# Altium PCB Revolution.PcbDoc (part 1 of 2)
Units mil, origin at the board's own origin, x right, y up, seen from the top; angles counter-clockwise.
Board outline 1417.32 x 1417.32 mil, 4 copper layers (Top Layer, Power, Ground, Bottom Layer), stack 89.2 mil thick; 97 components, 92 nets, 401 pads, 208 vias.
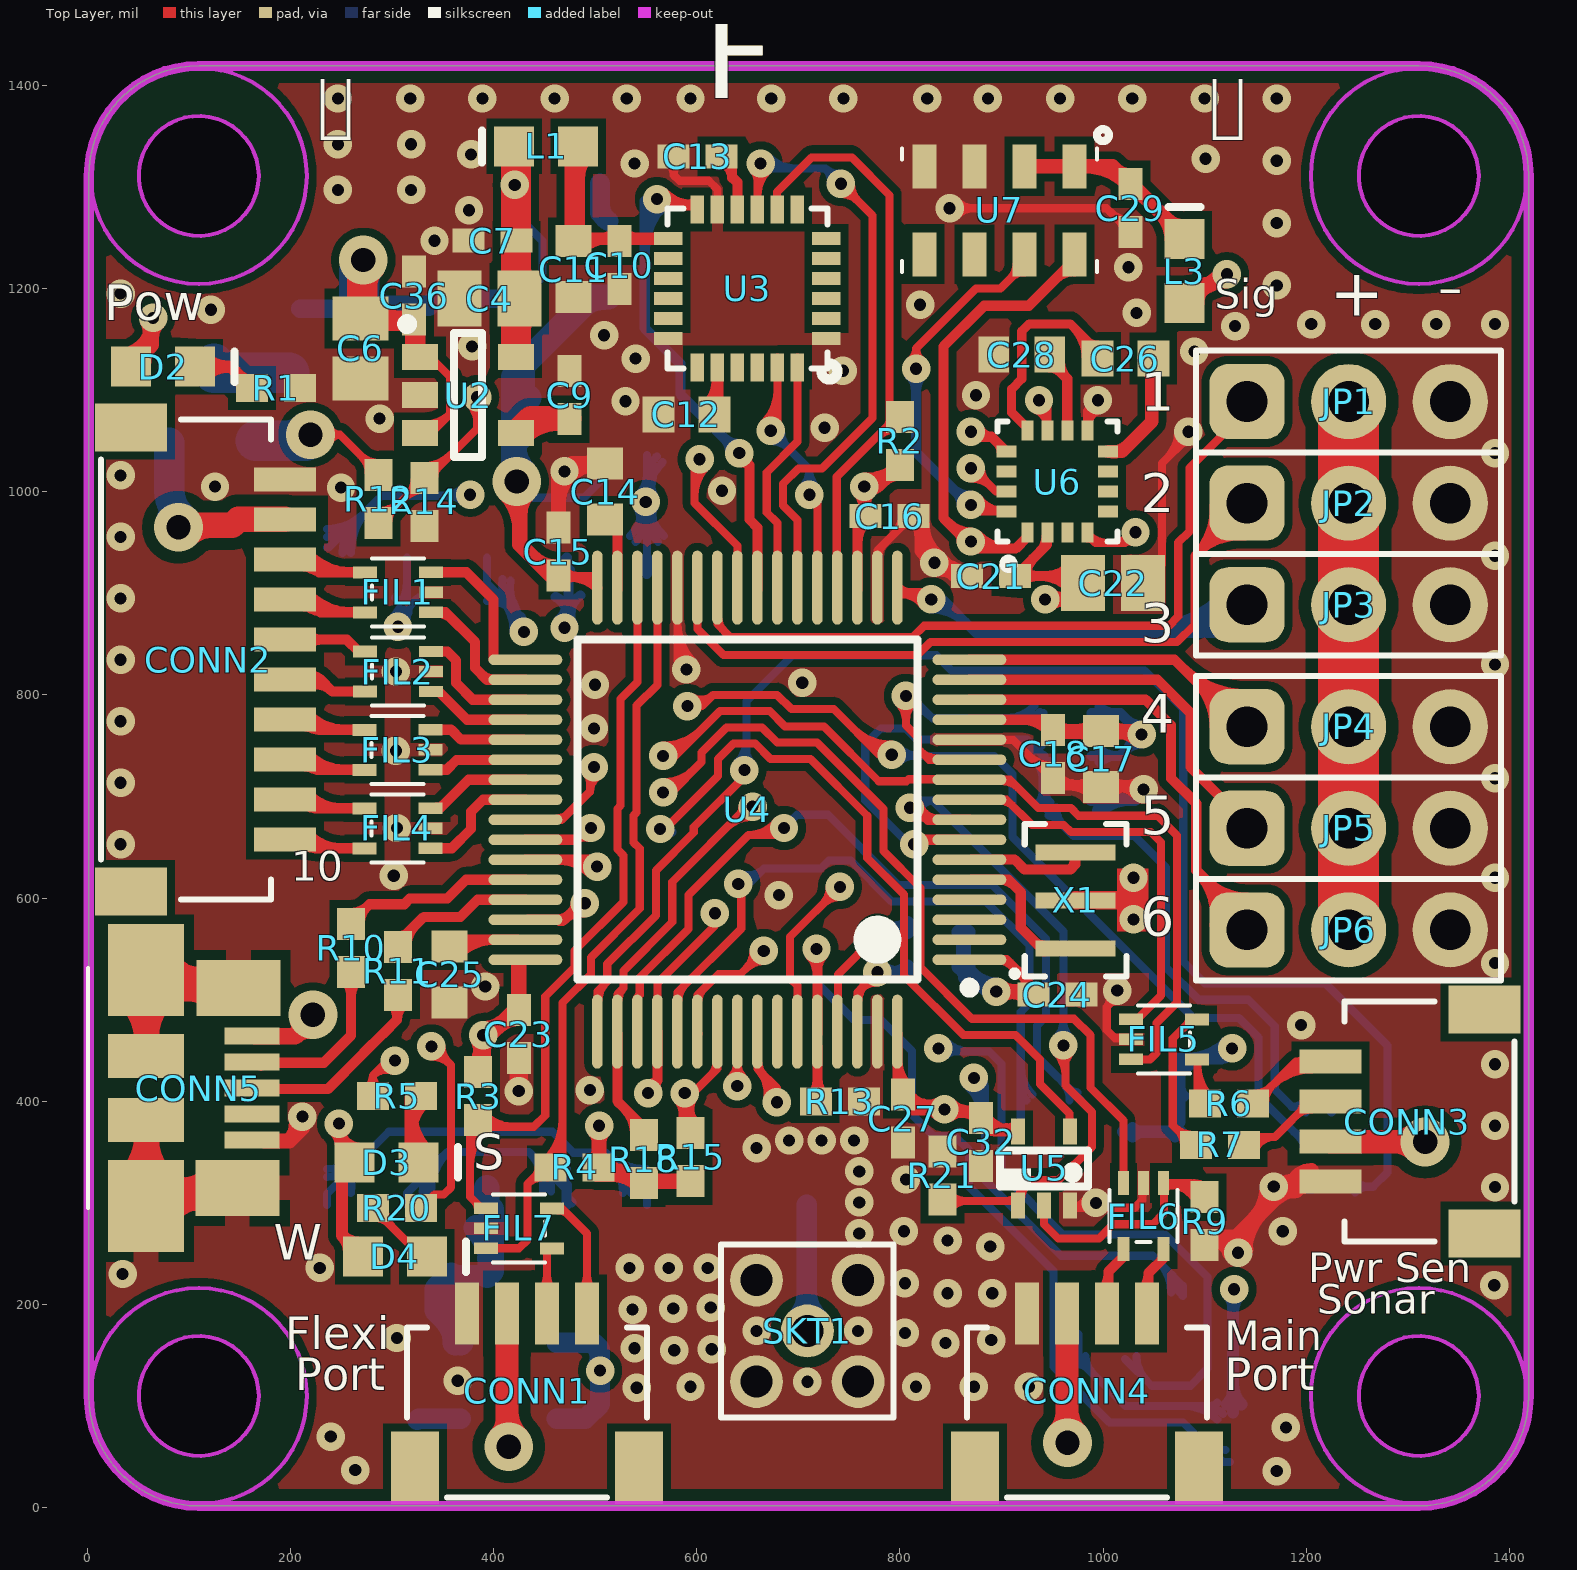
[diagram p0: Top Layer view]
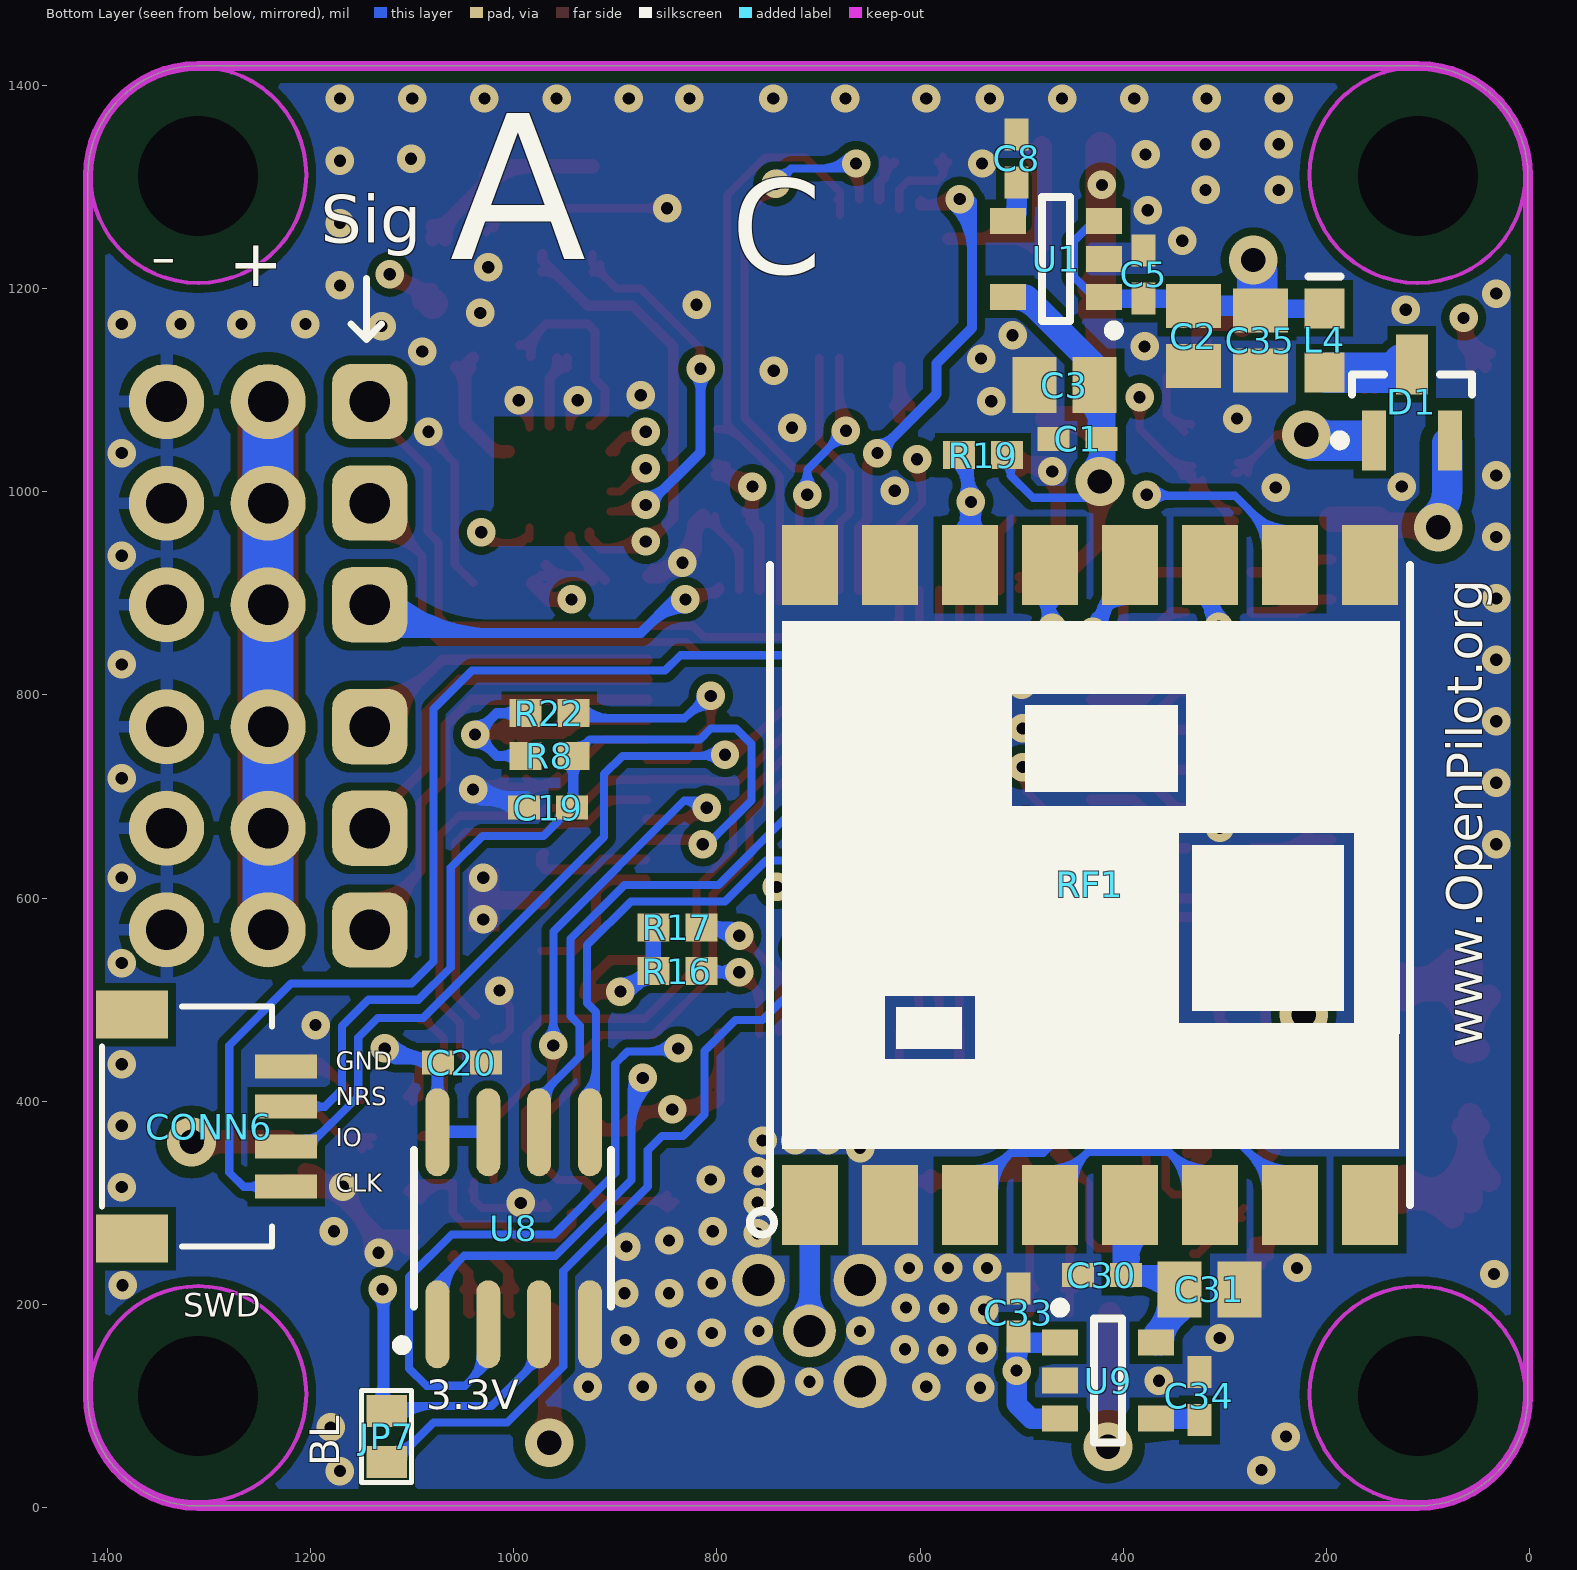
[diagram p1: Bottom Layer view, seen from below]
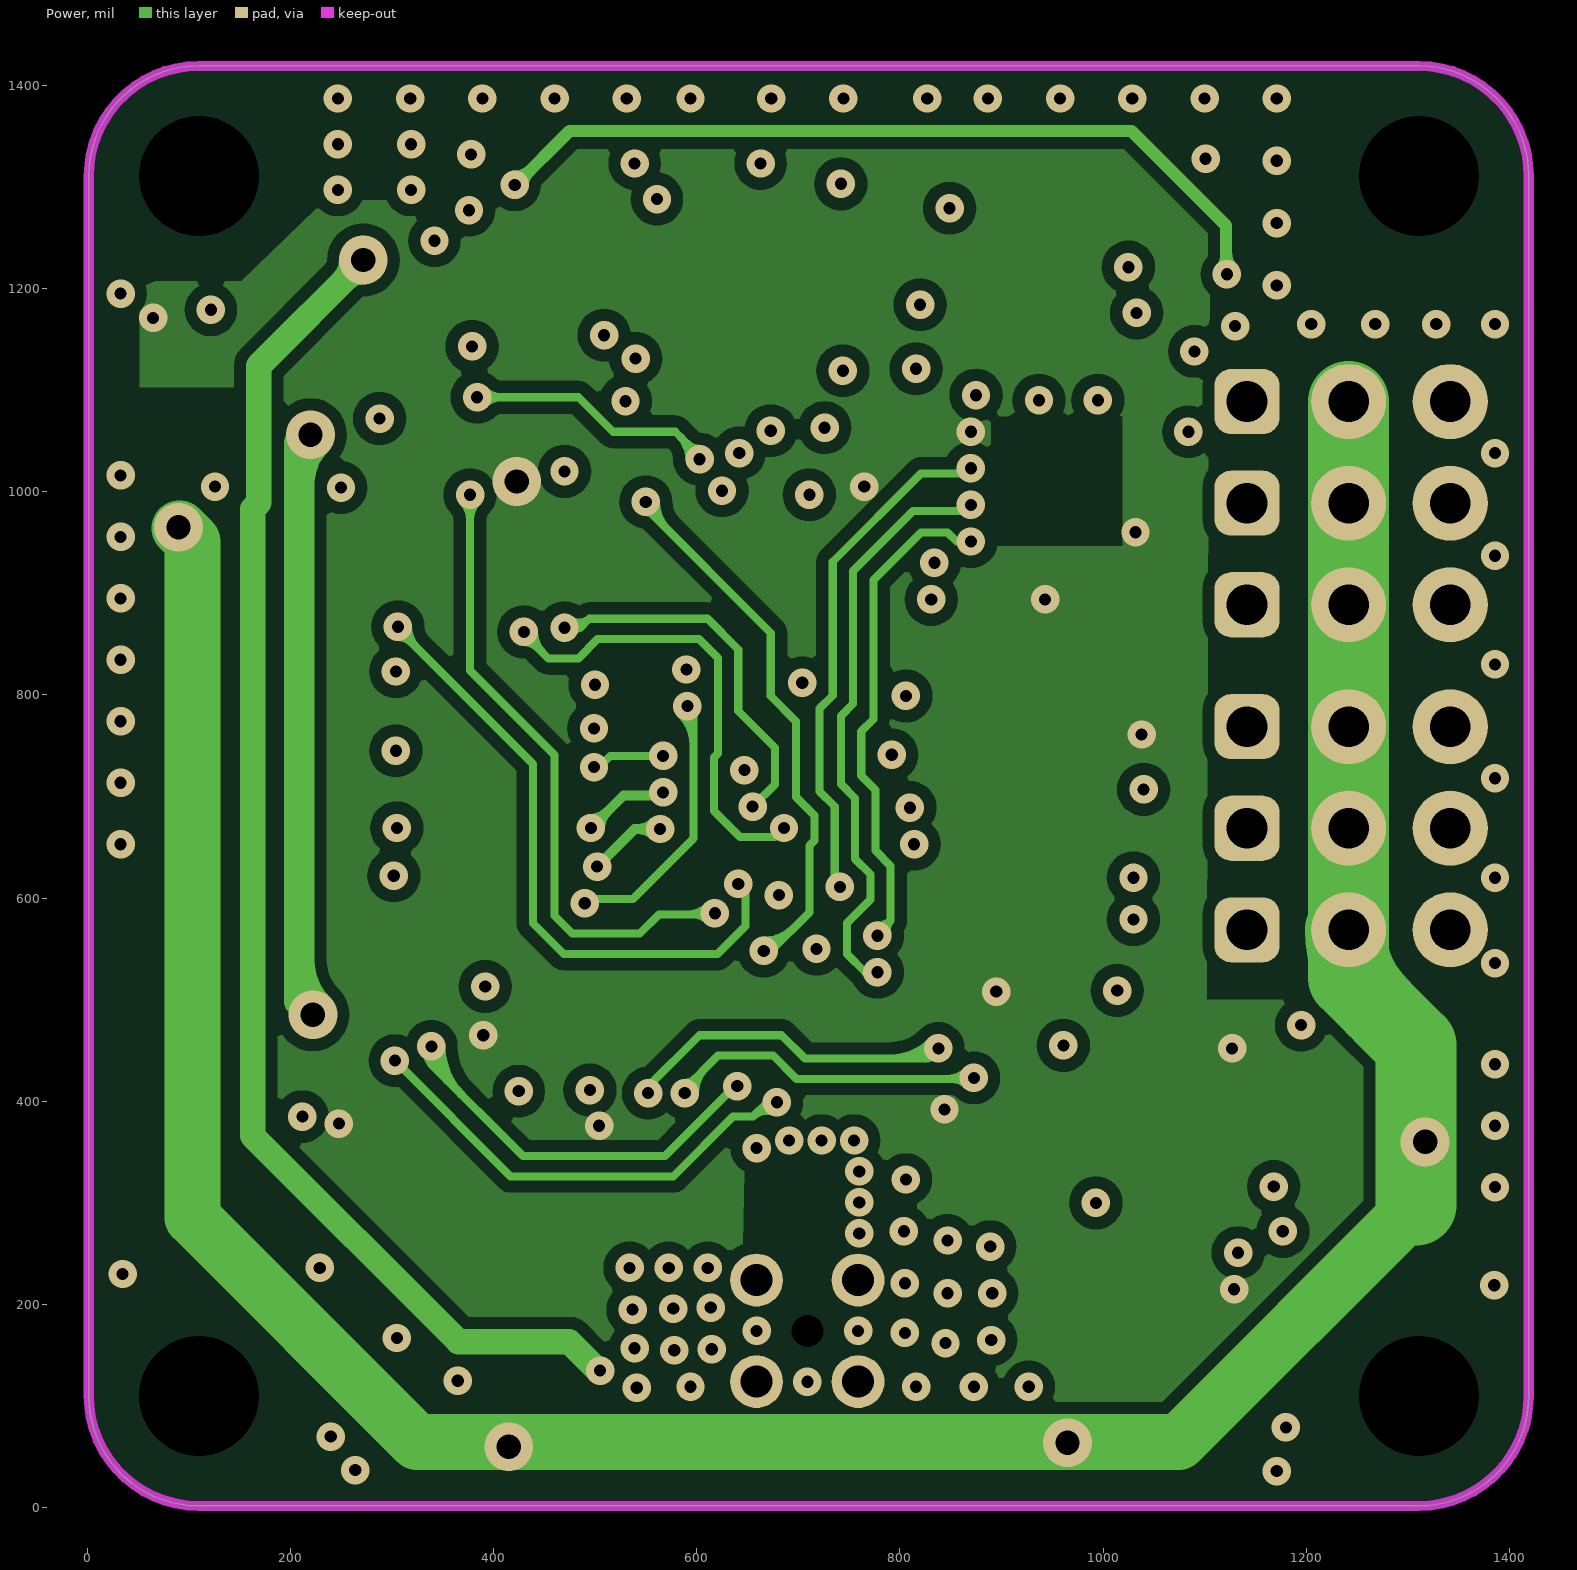
[diagram p2: Power]
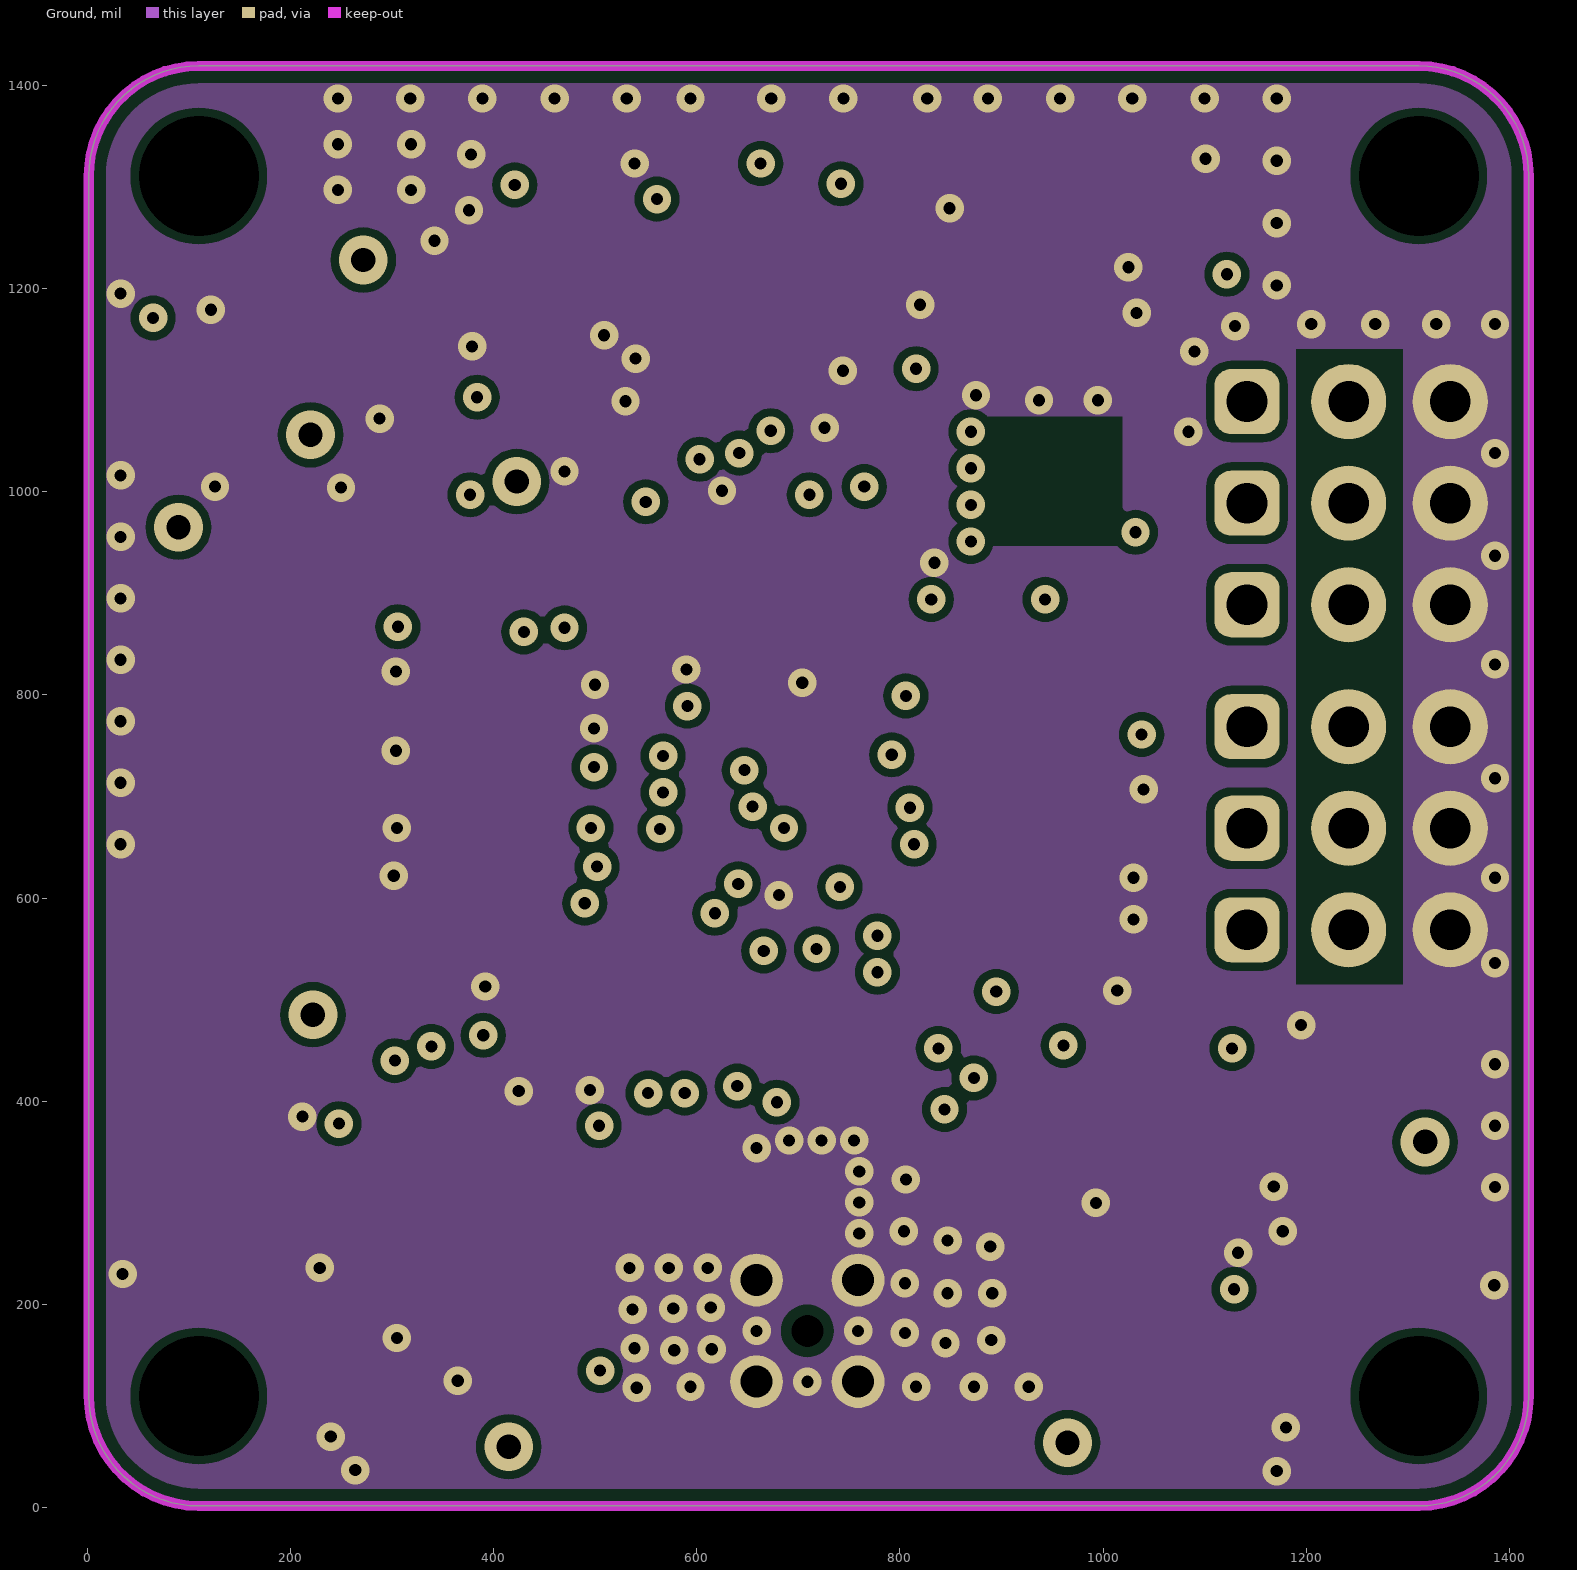
[diagram p3: Ground]
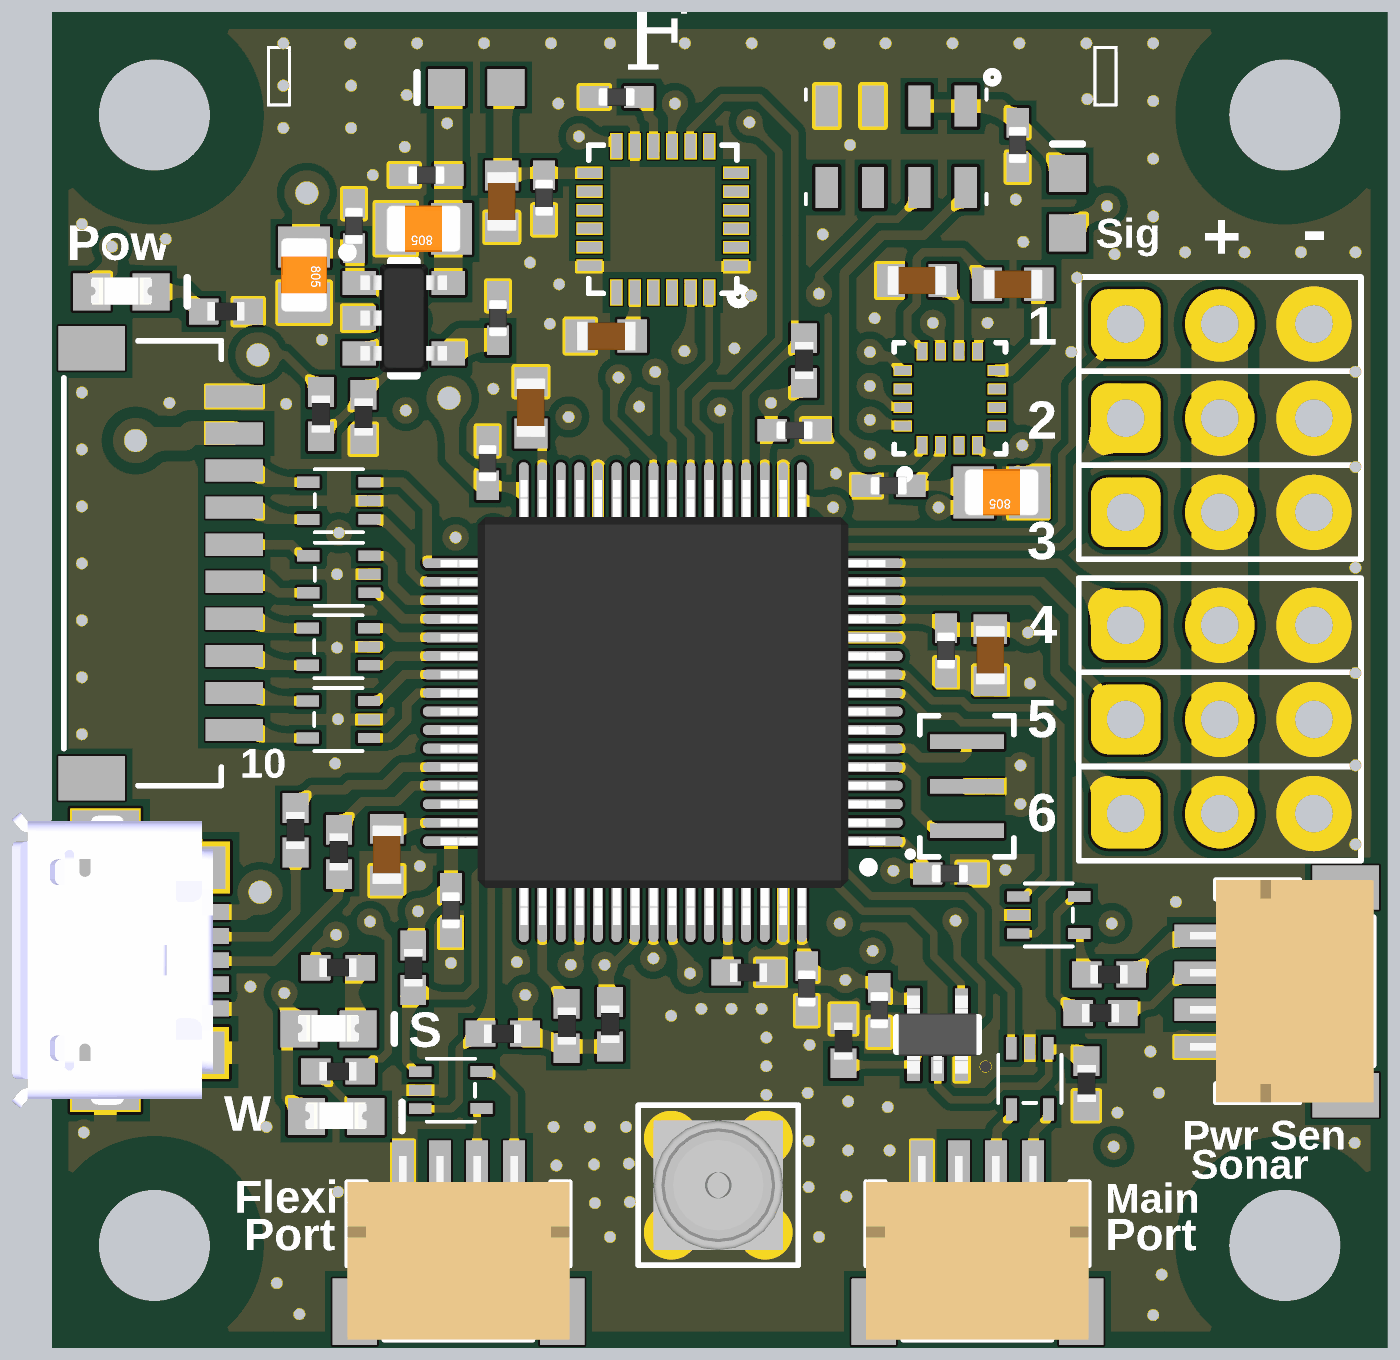
[diagram p5: 3D render of the assembled board from above, using the file's embedded part models]
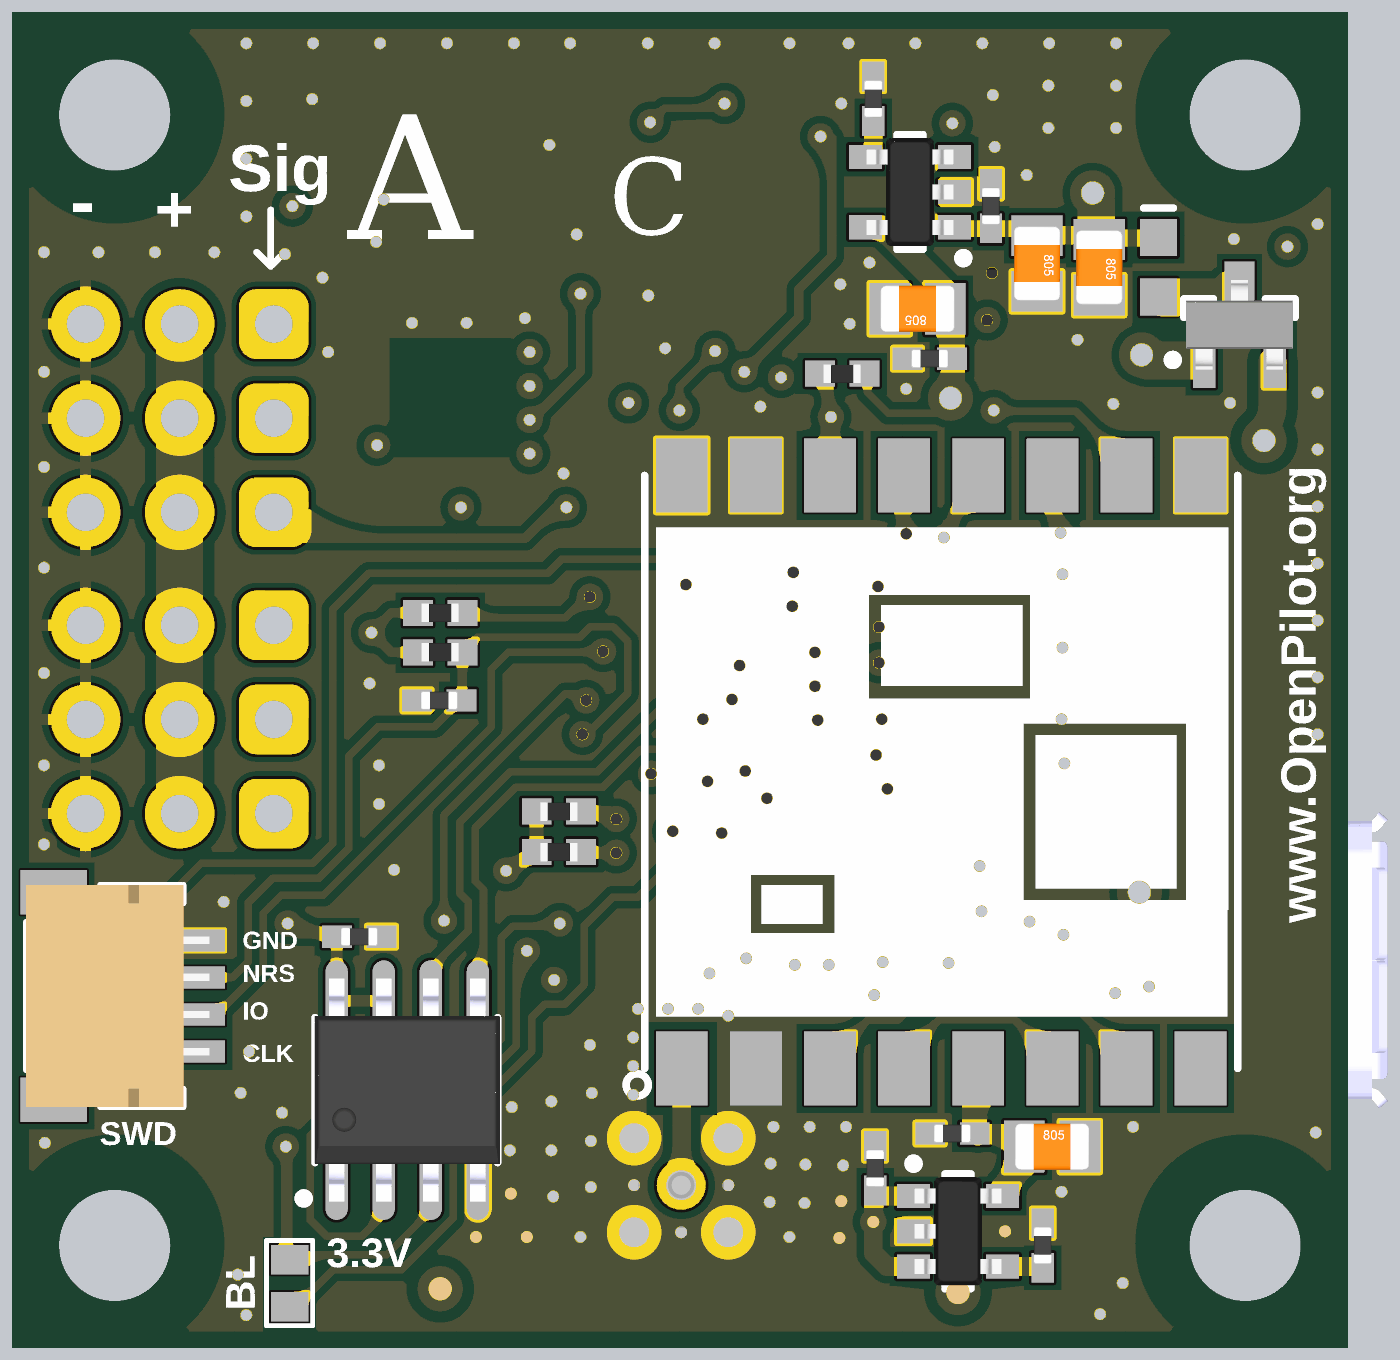
[diagram p6: 3D render of the assembled board from below, using the file's embedded part models]

## Layer stack, top to bottom
Top Solder: solder mask 0.4, Solder Resist, Dk 3.5
Top Layer: signal copper 1.4
Dielectric1: core 58.4, FR-4, Dk 4.8
Power: signal copper 1.4
Dielectric3: prepreg 12.6, FR-4, Dk 4.8
Ground: signal copper 1.4
Dielectric2: core 12.6, FR-4, Dk 4.8
Bottom Layer: signal copper 1.4
Bottom Solder: solder mask 0.4, Solder Resist, Dk 3.5

## Board outline
1.73,110 ccw(c110,110) 110,1.73 1310.79,1.73 ccw(c1310.79,110) 1419.06,110 1419.06,1310.79 ccw(c1310.79,1310.79) 1310.79,1419.06 110,1419.06 ccw(c110,1310.79) 1.73,1310.79

## Design rules (kind name [scope] priority, off if disabled: settings)
AcuteAngle [All] p1: minimum=6.00000000000000E+0001 checktracksonly=FALSE
Clearance CPWG [InNet('ANT') vs InPolygon] p1: gap=10
Clearance Clearance_osc [InNet('GND') vs InNet('OSC_IN') or InNet('OSC_OUT')] p2: gap=15
Clearance "Power Layer Pull Back" [OnLayer('Power') vs OnLayer('Keep-Out Layer')] p3: gap=30
Clearance Clearance_outline [All vs OnLayer('Keep-Out Layer')] p4: gap=12
Clearance "PWR Layer clearance" [All vs OnLayer('Power')] p5: gap=12
Clearance "VCC_UNREG Pour Clearance" [(InNamedPolygon('Top Layer-GND') OR InNamedPolygon('Bottom Layer-GND')) vs (InNet('VCC_UNREG'))] p6: gap=12
Clearance "Small Part Clearance Poly" [(HasFootprint('IMU-3000') OR HasFootprint('LPCC-16')) vs InPolygon] p7: gap=8
Clearance "Small Part Clearance" [(HasFootprint('IMU-3000') OR HasFootprint('LPCC-16'))] p8: gap=6
Clearance [All] p9: gap=8
ComponentClearance ComponentClearance_servo_headers [InComponent('JP1') or InComponent('JP2') or InComponent('JP3') or InComponent('JP4') or InComponent('JP5') or InComponent('JP6')] p1: gap=5 collisioncheckmode=3 verticalgap=10 showdistances=FALSE
ComponentClearance [All] p2: gap=10 collisioncheckmode=3 verticalgap=10 showdistances=FALSE
DiffPairsRouting [All] p1: maxlimit=20 minlimit=6 mostfreqgap=10 toplayer_minwidth=15 toplayer_maxwidth=15 toplayer_prefwidth=15 midlayer1_mingap=10 midlayer1_maxgap=10 midlayer1_minwidth=15 midlayer1_maxwidth=15 midlayer1_prefwidth=15 midlayer2_mingap=10 midlayer2_maxgap=10 midlayer2_minwidth=15 midlayer2_maxwidth=15 midlayer2_prefwidth=15 bottomlayer_minwidth=15 bottomlayer_maxwidth=15 bottomlayer_prefwidth=15 maxuncoupledlength=500
HoleSize [All] p1: absolutevalues=TRUE maxlimit=1000 minlimit=12 maxpercent=80.000 minpercent=20.000
MinimumAnnularRing [All] p1: minimumring=8
MinimumSolderMaskSliver MinimumSolderMaskSliver_FIL1-3 [InComponent('FIL1') or InComponent('FIL2') or InComponent('FIL3')] p1: minsoldermaskwidth=1
MinimumSolderMaskSliver [All] p2: minsoldermaskwidth=3
PlaneClearance [All] p1: clearance=15
PlaneConnect [All] p1: planeconnectstyle=Direct reliefexpansion=20 reliefentries=4 reliefconductorwidth=10 reliefairgap=10
PolygonConnect PolygonConnect_Headers [(HasFootprint('SIP3 - 0.1')) vs IsNamedPolygon('Bottom Layer-GND')] p1: connectstyle=Relief reliefconductorwidth=12 reliefentries=4 polygonreliefangle="90 Angle" airgapwidth=10
PolygonConnect PolygonConnect_usb [HasFootprint('Micro_USB')] p2: connectstyle=Relief reliefconductorwidth=24 reliefentries=4 polygonreliefangle="90 Angle" airgapwidth=10
PolygonConnect [All] p3: connectstyle=Direct reliefconductorwidth=12 reliefentries=4 polygonreliefangle="90 Angle" airgapwidth=10
RoutingVias [All] p1: holewidth=12 width=28 viastyle="Through Hole" minholewidth=12 minwidth=28 maxholewidth=28 maxwidth=50
SilkToSilkClearance SilkToSilkClearance_text [IsText] p1: silktosilkclearance=0
SilkToSilkClearance [All] p2: silktosilkclearance=4
SilkToSolderMaskClearance SilkscreenOverComponentPads [IsPad] p1: minsilkscreentomaskgap=2 clearancetoexposedcopper=TRUE
SolderMaskExpansion [All] p1: expansion=3
Width [All] p1: maxlimit=400 minlimit=8 preferedwidth=10
22 further rules are at their usual default settings.

## Classes and differential pairs
differential pair USB_R: +USB_R_P -USB_R_N

## Components (designator, comment, footprint, x,y, rotation, side; value= is the part's Value field where it differs from the comment)
C1 "10n" CAP402N 445,1052 r0 bottom
C2 "Cap805" CAP805L#1 331,1153 r270 bottom
C3 "Cap805" CAP805L#2 458,1105 r0 bottom
C4 "Cap805" CAP805L#2 396,1190 r180 top
C5 "10n" CAP402N 380,1214 r90 bottom
C6 "Cap805" CAP805L#2 269,1141 r270 top
C7 "10n" CAP402N 399,1247 r180 top
C8 "10n" CAP402N 505,1328 r90 bottom
C9 "10n" CAP402N 475,1095 r90 top
C10 "Cap402" CAP402N 524,1223 r90 top
C11 "Cap603" CAP603L#1 479,1219 r270 top
C12 "Cap603" CAP603L#1 590,1076 r0 top
C13 "Cap402" CAP402N 601,1330 r180 top
C14 "Cap603" CAP603L#1 510,1000 r270 top
C15 "Cap402" CAP402N 464,941 r90 top
C16 "Cap402" CAP402N 790,976 r180 top
C17 "Cap603" CAP603L#1 998,737 r90 top
C18 "10n" CAP402N 951,742 r270 top
C19 "Cap402" CAP402N 966,689 r180 bottom
C20 "Cap402" CAP402N 1051,438 r0 bottom
C21 "Cap402" CAP402N 890,917 r180 top
C22 "Cap805" CAP805L#2 1010,910 r180 top
C23 "Cap402" CAP402N 425,466 r270 top
C24 "Cap402" CAP402N 955,505 r180 top
C25 "Cap603" CAP603L#1 357,525 r90 top
C26 "Cap603" CAP603L#1 1022,1131 r0 top
C27 "Cap402" CAP402N 803,383 r270 top
C28 "Cap603" CAP603L#2 920,1135 r180 top
C29 "Cap402" CAP402N 1027,1279 r270 top
C30 "10n" CAP402N 421,229 r0 bottom
C31 "Cap805" CAP805L#2 315,215 r180 bottom
C32 "Cap402" CAP402N 880,360 r270 top
C33 "Cap402" CAP402N 503,192 r270 bottom
C34 "10n" CAP402N 325,110 r90 bottom
C35 "Cap805" CAP805L#1 265,1149 r270 bottom
C36 "10n" CAP402N 322,1193 r90 top
CONN1 "Flexi Port" "JST SH 4 Pin Side Entry" 433.07,10 r0 top locked
CONN2 "Input Header" "JST SH 10 PIN SIDE ENTRY" 13.9,834.68 r270 top
CONN3 "Current / Volt Sens & Sonar" "JST SH 4 Pin Side Entry" 1405,380 r90 top
CONN4 "Main USART" "JST SH 4 Pin Side Entry" 984.25,10 r0 top locked
CONN5 "Micro USB B" Micro_USB 58,413 r270 top
CONN6 "SWD" "JST SH 4 Pin Side Entry" 1405,375 r270 bottom
D1 "PMEG4005CT" SOT23-3N 116,1088 r90 bottom
D2 "Green" LED603N 75,1123 r180 top
D3 "STAT" LED603N 295,340 r180 top
D4 "WARN" LED603N 303,247 r180 top
FIL1 "IP4256CZ5-W,115" SOT-665 306,901 r180 top
FIL2 "IP4256CZ5-W,115" SOT-665 306,823 r180 top
FIL3 "IP4256CZ5-W,115" SOT-665 305.52,746 r180 top
FIL4 "IP4256CZ5-W,115" SOT-665 305.52,668.69 r180 top
FIL5 "IP4256CZ5-W,115" SOT-665 1060,461 r0 top
FIL6 "IP4256CZ5-W,115" SOT-665 1040,287 r270 top
FIL7 "IP4256CZ5-W,115" SOT-665 425,275 r0 top
JP1 "Servo out 1" "SIP3 - 0.1" 1141.73,1088.73 r0 top locked
JP2 "Servo out 2" "SIP3 - 0.1" 1141.73,988.73 r0 top locked
JP3 "Servo out 3" "SIP3 - 0.1" 1141.73,888.73 r0 top locked
JP4 "Servo out 4" "SIP3 - 0.1" 1141.73,768.73 r0 top locked
JP5 "Servo out 5 & Govenor Input" "SIP3 - 0.1" 1141.73,668.73 r0 top locked
JP6 "Servo out 6" "SIP3 - 0.1" 1141.73,568.73 r0 top locked
JP7 "SBL" "TOUCH JMP 2PAD" 1125,70 r0 bottom
L1 "FB 300mA" IND603N 452,1340 r0 top
L3 "FB 300mA" IND603N 1080,1217 r270 top
L4 "FB 300mA" IND603N 202,1149 r270 bottom
R1 "Res402" RES402N 186,1102 r180 top
R2 "Res402" RES402N 800,1050 r90 top
R3 "Res402" RES402N 385,405 r90 top
R4 "Res402" RES402N 480,335 r0 top
R5 "Res402" RES402N 305,405 r180 top
R6 "Res402" RES402N 1124,398 r0 top
R7 "Res402" RES402N 1115,357 r0 top
R8 "Res402" RES402N 965,740 r0 bottom
R9 "Res402" RES402N 1100,282 r90 top
R10 "Res402" RES402N 260,551 r270 top
R11 "Res402" RES402N 306,528 r270 top
R12 "Res402" RES402N 287,993 r270 top
R13 "Res402" RES402N 741,400 r0 top
R14 "Res402" RES402N 332,990 r90 top
R15 "Res402" RES402N 594,345 r90 top
R16 "Res402" RES402N 839,528 r180 bottom
R17 "Res402" RES402N 839,571 r180 bottom
R18 "Res402" RES402N 548,343 r90 top
R19 "Res402" RES402N 538,1036 r180 bottom
R20 "Res402" RES402N 305,295 r0 top
R21 "Res402" RES402N 842,327 r270 top
R22 "Res402" RES402N 965,782 r180 bottom
RF1 "RFM22B-S2" RFM22-S2 432.89,613 r90 bottom locked
SKT1 "MMCX Thru hole" MMCX_SOCKET 709,174 r90 top
U1 "REG113NA-3.3" SOT23-5L 466,1229 r0 bottom
U2 "REG113NA-3.3" SOT23-5L 375,1095 r0 top
U3 "MPU-6000" IMU-3000 650,1200 r180 top
U4 "STM32F405RGT6" "STM32 64 Lead" 650,687 r180 top
U5 "XOR" DCK-5 942,334 r90 top
U6 "HMC5883L" LPCC-16 955,1010 r90 top
U7 "Pressure Sensor" MS5611-01BA03 898,1277 r270 top
U8 "Flash 16Mbits" SOIC8_N 1000,275 r90 bottom
U9 "REG113NA-3.3" SOT23-5L 415,125 r180 bottom
X1 "8Mhz Ceralock" "CERALOCK 8Mhz" 973,597.76 r90 top

## Footprints (in the part's own frame and the unit in brackets; to place one, negate y for a bottom-side part, rotate by r counter-clockwise, add the part's x,y. Pads: shape width x height; smd on the part's side, far side on the other; paste and mask are expansions set on the pad)
CAP402N [mm] "Chip Capacitor, Body 1.0x0.5mm, IPC Medium Density"
  rect 0.8x0.6 smd: 1(-0.6,0) 2(0.6,0)
  body extent -0.5,-0.25 0.5,0.25, height 0.6
CAP603L#1 [mm] "Chip Capacitor, Body 1.6x0.8mm, IPC High Density"
  rect 0.8x0.9 smd: 1(-0.7,0) 2(0.7,0)
  body extent -0.8,-0.4 0.8,0.4, height 0.77
CAP603L#2 [mm] "Chip Capacitor, Body 1.6x0.8mm, IPC High Density"
  rect 0.762x0.9 smd: 1(-0.7,0) 2(0.7,0)
  body extent -0.8,-0.4 0.8,0.4, height 0.77
CAP805L#1 [mm] "Chip Capacitor, Body 2.0x1.3mm, IPC High Density"
  rect 1.1x1.38 smd: 1(-0.75,0) 2(0.75,0)
  body extent -1,-0.62 1,0.63, height 0.78
CAP805L#2 [mm] "Chip Capacitor, Body 2.0x1.3mm, IPC High Density"
  rect 1.1x1.4 smd: 1(-0.75,0) 2(0.75,0)
  body extent -1,-0.62 1,0.63, height 0.78
"CERALOCK 8Mhz" [mm] "Digikey 490-1195-1-ND"
  rect 0.4x2 smd: 1(-1.2,0) 2(1.2,0) 3(0,0)
  silkscreen extent -1.91,-1.27 1.91,1.58, body extent -1.78,-1.14 1.78,1.14, height 0.5
DCK-5 [mm] "SOT23-DCK, 5-Leads, Body 2.2x2.4mm (max), Pitch 0.65mm, IPC High Density"
  rect 0.65x0.35 smd mask+0.076: 1(-0.925,0.65) 2(-0.925,0) 3(-0.925,-0.65) 4(0.925,-0.65) 5(0.925,0.65)
  silkscreen extent -0.45,-1.1 0.45,1.1, body extent -1.05,-1.05 1.05,1.05, height 1
IMU-3000 [mm]
  rect 0.711x0.337 smd paste-0.03 mask+0.04: 1(-1.975,1.25) 2(-1.975,0.75) 3(-1.975,0.25) 4(-1.975,-0.25) 5(-1.975,-0.75) 6(-1.975,-1.25) 13(1.975,-1.25) 14(1.975,-0.75) 15(1.975,-0.25) 16(1.975,0.25) 17(1.975,0.75) 18(1.975,1.25)
  rect 0.337x0.711 smd paste-0.03 mask+0.04: 7(-1.25,-1.975) 8(-0.75,-1.975) 9(-0.25,-1.975) 10(0.25,-1.975) 11(0.75,-1.975) 12(1.25,-1.975) 19(1.25,1.975) 20(0.75,1.975) 21(0.25,1.975) 22(-0.25,1.975) 23(-0.75,1.975) 24(-1.25,1.975)
  silkscreen extent -2.25,-2 2,2.27, body extent -2,-2 2,2, height 0.95
IND603N [mm] "Chip Inductor, Body 1.6x0.8mm, IPC Medium Density"
  rect 1x1 smd: 1(-0.8,0) 2(0.8,0)
  silkscreen extent -1.6,-0.4 -1.6,0.4, body extent -0.87,-0.48 0.87,0.48, height 0.71
"JST SH 4 Pin Side Entry" [mm] "SM04B-SRSS-TB"
  rect 1.2x1.8 smd paste+0 mask+0.051: 0(-2.8,0.75) 0(2.8,0.75)
  rect 0.6x1.55 smd paste+0 mask+0.051: 1(-1.5,4.6) 2(-0.5,4.6) 3(0.5,4.6) 4(1.5,4.6)
  silkscreen extent -3,0 3,4.25, body extent -3,0 3,4.95, height 2.92
"JST SH 10 PIN SIDE ENTRY" [mm] "SM10B-SRSS-TB"
  rect 1.2x1.8 smd paste+0 mask+0.051: 0(-5.8,0.75) 0(5.8,0.75)
  rect 0.6x1.55 smd paste+0 mask+0.051: 1(-4.5,4.6) 2(-3.5,4.6) 3(-2.5,4.6) 4(-1.5,4.6) 5(-0.5,4.6) 6(0.5,4.6) 7(1.5,4.6) 8(2.5,4.6) 9(3.5,4.6) 10(4.5,4.6)
  silkscreen extent -6,0 6,4.25, body extent -6,0 6,4.25, height 2.9
LED603N [mm] "Chip LED, Body 1.6x0.8mm, IPC Medium Density"
  rect 1x1 smd: 1(-0.8,0) 2(0.8,0)
  silkscreen extent -1.78,-0.38 -1.78,0.38, body extent -0.82,-0.38 0.82,0.34, height 0.68
LPCC-16 [mm] "Honeywell 16 lead LPCC pakcage"
  rect 0.5x0.3 smd paste-0.025 mask+0.056: 1(-1.27,0.75) 2(-1.27,0.25) 4(-1.27,-0.75) 9(1.27,-0.75) 10(1.27,-0.25) 11(1.27,0.25) 12(1.27,0.75)
  rect 0.5x0.3 smd paste-0.025 mask+0.064: 3(-1.27,-0.25)
  rect 0.3x0.5 smd paste-0.025 mask+0.056: 5(-0.75,-1.27) 6(-0.25,-1.27) 7(0.25,-1.27) 8(0.75,-1.27) 13(0.75,1.27) 14(0.25,1.27) 15(-0.25,1.27) 16(-0.75,1.27)
  silkscreen extent -2.16,-1.5 1.5,1.5, body extent -1.5,-1.5 1.5,1.5, height 0.9
Micro_USB [mm] "Digikey WM17141CT-ND"
  rect 2.3x1.9 smd paste-0.051: 0(-2.946,0) 0(2.946,0)
  rect 1.4x2.1 smd paste-0.127: 0(-2.5,2.311) 0(2.5,2.286)
  rect 1.1x1.9 smd paste-0.203: 0(-0.8,0) 0(0.8,0)
  rect 0.425x1.38 smd mask+0.064: 1(-1.3,2.65) 2(-0.65,2.65) 3(0,2.65) 4(0.65,2.65) 5(1.3,2.65)
  silkscreen extent -3,-1.45 3,-1.45, body extent -3.99,-2.53 3.99,2.9, height 2.69
MMCX_SOCKET [mil] "Digikey ARF1729-ND and 07248"
  round 52 / inner round 0 / far side round 52 hole 31.5: 1(0,0)
  round 52 hole 31.5: 2(-50,-50) 2(-50,50) 2(50,-50) 2(50,50)
  silkscreen extent -85,-85 85,85, body extent -69,-69 69,69, height 177
MS5611-01BA03 [mm] "MS5611-01BA03 Pressure Sensor"
  rect 1.1x0.6 smd mask+0.1: 1(-1.1,1.875) 2(-1.1,0.625) 3(-1.1,-0.625) 4(-1.1,-1.875) 5(1.1,-1.875) 6(1.1,-0.625) 7(1.1,0.625) 8(1.1,1.875)
  silkscreen extent -2.03,-2.44 1.55,2.74, body extent -1.5,-2.36 1.5,2.36, height 1.02
RES402N [mm] "Chip Resistor, Body 1.1x0.5mm, IPC Medium Density"
  rect 0.8x0.7 smd: 1(-0.6,0) 2(0.6,0)
  body extent -0.5,-0.25 0.5,0.25, height 0.27
RFM22-S2 [mm] "SMT RFM22"
  rect 2x1.4 smd mask+0.051: 1(-8,7) 3(-8,3) 4(-8,1) 5(-8,-1) 6(-8,-3) 7(-8,-5) 8(-8,-7) 9(8,-7) 10(8,-5) 11(8,-3) 12(8,-1) 13(8,1) 14(8,3) 15(8,5)
  rect 2x1.4 smd mask+0: 2(-8,5)
  rect 2x1.4 smd: 16(8,7)
  silkscreen extent -8.74,-8 8,8.5, body extent -8.1,-8 8,8.05, height 1.9
"SIP3 - 0.1" [mil] "Standard 0.1 3 Pin Header"
  rrect50% 74x74 / inner rrect50% 64x64 / far side rrect50% 74x74 hole 40: 1(0,0)
  round 74 hole 40: 2(100,0) 3(200,0)
  silkscreen extent -50,-50 250,50, body extent -47,-47 248,47, height 394
SOIC8_N [mm] "8-Pin Small Outline Integrated Circuit Package (SOIC8), IPC Medium Density"
  oval 2.2x0.6 smd: 1(-2.4,1.905) 2(-2.4,0.635) 3(-2.4,-0.635) 4(-2.4,-1.905) 5(2.4,-1.905) 6(2.4,-0.635) 7(2.4,0.635) 8(2.4,1.905)
  silkscreen extent -3.05,-2.44 1.96,2.92, body extent -3.01,-2.5 3.01,2.5, height 1.75
SOT23-3N [mm] "SOT23, 3-Leads, Body 2.9x1.3mm, Pitch 0.95mm, Lead Span 2.5mm, IPC Medium Density"
  rect 1.5x0.6 smd: 1(-0.95,0.95) 2(-0.95,-0.95)
  rect 1.5x0.8 smd: 3(0.95,0)
  silkscreen extent -1.07,-1.5 0.7,1.93, body extent -1.21,-1.45 1.21,1.45, height 0.99
SOT23-5L [mm] "SOT23, 5-Leads, Body 2.9x1.6mm, Pitch 0.95mm, Lead Span 2.8mm, IPC High Density"
  rect 0.9x0.65 smd mask+0.076: 1(-1.2,0.95) 2(-1.2,0) 3(-1.2,-0.95) 4(1.2,-0.95) 5(1.2,0.95)
  silkscreen extent -1.56,-1.55 0.35,1.91, body extent -1.17,-1.46 1.17,1.46, height 0.97
SOT-665 [mm] "NXP SOT665"
  rect 0.6x0.28 smd mask+0.076: 1(-0.825,0.5) 2(-0.825,0) 3(-0.825,-0.5)
  rect 0.6x0.3 smd mask+0.076: 4(0.825,-0.5) 5(0.825,0.5)
  silkscreen extent -0.65,-0.85 0.65,0.85, body extent -0.65,-0.85 0.65,0.85, height 0.6
"STM32 64 Lead" [mm] "Thin QFP, 64-Leads, Body 10x10mm, Pitch 0.5mm, IPC Medium Density"
  oval 1.85x0.265 smd mask+0.076: 1(-5.55,3.75) 2(-5.55,3.25) 3(-5.55,2.75) 4(-5.55,2.25) 5(-5.55,1.75) 6(-5.55,1.25) 7(-5.55,0.75) 8(-5.55,0.25) 9(-5.55,-0.25) 10(-5.55,-0.75) 11(-5.55,-1.25) 12(-5.55,-1.75) 13(-5.55,-2.25) 14(-5.55,-2.75) 15(-5.55,-3.25) 16(-5.55,-3.75) 33(5.55,-3.75) 34(5.55,-3.25) 35(5.55,-2.75) 36(5.55,-2.25) 37(5.55,-1.75) 38(5.55,-1.25) 39(5.55,-0.75) 40(5.55,-0.25) 41(5.55,0.25) 42(5.55,0.75) 43(5.55,1.25) 44(5.55,1.75) 45(5.55,2.25) 46(5.55,2.75) 47(5.55,3.25) 48(5.55,3.75)
  oval 0.265x1.85 smd mask+0.076: 17(-3.75,-5.55) 18(-3.25,-5.55) 19(-2.75,-5.55) 20(-2.25,-5.55) 21(-1.75,-5.55) 22(-1.25,-5.55) 23(-0.75,-5.55) 24(-0.25,-5.55) 25(0.25,-5.55) 26(0.75,-5.55) 27(1.25,-5.55) 28(1.75,-5.55) 29(2.25,-5.55) 30(2.75,-5.55) 31(3.25,-5.55) 32(3.75,-5.55) 49(3.75,5.55) 50(3.25,5.55) 51(2.75,5.55) 52(2.25,5.55) 53(1.75,5.55) 54(1.25,5.55) 55(0.75,5.55) 56(0.25,5.55) 57(-0.25,5.55) 58(-0.75,5.55) 59(-1.25,5.55) 60(-1.75,5.55) 61(-2.25,5.55) 62(-2.75,5.55) 63(-3.25,5.55) 64(-3.75,5.55)
  silkscreen extent -5.68,-4.25 4.25,4.57, body extent -6.01,-5.99 5.99,6.01, height 1.7
"TOUCH JMP 2PAD" [mil] "Touch Jumper 2 Pad"
  rect 40x31.5 smd mask+2: 1(0,25) 2(0,-25)
  silkscreen extent -25,-45 25,45

## Part data
C1 C5 C7 C8 C9 C18 C30 C34 C36: library part Cap402, "Capacitor SMD"
C2 C3 C4 C6 C10 C11 C12 C13 C14 C15 C16 C17 C19 C20 C21 C22 C23 C24 C25 C26 C27 C28 C29 C31 C32 C33 C35: "Capacitor SMD"
CONN1 CONN3 CONN4 CONN6: library part "JST-SH 4-pin Side Entry Socket", "JST-SH 4-pin Side Entry Socket"
CONN2: library part "JST-SH 10-pin Side Entry Socket", "JST-SH 10-pin Side Entry Socket"
CONN5: library part "USB Micro B SMT", "USB Micro B SMT Socket"
D1: "Dual Diode Command Cathode 500ma"
D2: library part "LED 603 Gr", "Green 603 LED"
D3: library part "LED 603 Bl", "Blue 603 LED"
D4: library part "LED 603 Or", "Orange 603 LED"
FIL1 FIL2 FIL3 FIL4 FIL5 FIL6 FIL7: library part "RF Filter 100R 30pF", "IP4256CZ5-W,115 2 channel, 100R, 30pF, RF ESD Filter"
JP1 JP2 JP3 JP4 JP5 JP6: library part "Hdr 3 Pin 0.1", "Header, 3-Pin, 0.1\""
JP7: library part "2 PAD Touch JMP", "2 Pad Touch Jumper"
L1 L3 L4: library part "FerriteBead 300mA", "Ferrite Bead 300mA"
R1 R2 R3 R4 R5 R6 R7 R8 R9 R10 R11 R12 R13 R14 R15 R16 R17 R18 R19 R20 R21 R22: "Resistor SMD"
RF1: "UHF 100mW Transceiver"
SKT1: "MMCX Socket"
U1 U2 U9: "3.3V 400mA LDO Regulator"
U3: library part MPU-3/6000, "Invensense MPU-3/6000,  3-axis Gyros & Accel on 6000"
U4: library part STM32F103RET6, "STM32 ARM-based 32-bit MCU with 1MB Flash, 64-pin LQFP, Industrial Temperature"
U5: library part "XOR SN74LVC1G86DCKR", "XOR Gate SN74LVC1G86DCKR"
U6: "IC, Magnetometer, 3 axis, +/- 8 Oe, I2C, 160Hz"
U7: library part MS5611-01BA03, "Pressure Sensor - MS5611-01BA03"
U8: library part "Flash 16Mb 75MHZ 8SOIC", "16Mbit SPI Flash Memory"
X1: library part CERALOCK8, "Ceralock 8Mhz with caps"

## Free pads (board coordinates)
  round 0 hole 118.11 unplated: 0(110,110) 0(110,1310.79) 0(1310.79,110) 0(1310.79,1310.79)

## Via types
v1: diameter 28, hole 12, Top Layer to Bottom Layer, tented both sides, 200 vias
v2: diameter 48, hole 24, Top Layer to Bottom Layer, tented both sides, 8 vias

## Nets (pads, with @x,y where several pads share a name; then routed paths per layer and width w, separated by ;. In a path a pad name is that pad's centre, name@x,y a point inside that pad or via, vN(x,y) a via of type N, cw(c..) or ccw(c..) an arc to the next point about the centre after c; other vN are vias at no path point)
ANT: RF1.1 SKT1.1 | length 184.9
  Bottom Layer w19: SKT1.1@708.48,174.52 SKT1.1@709,174
  Bottom Layer w20: SKT1.1@697.69,185.31 ccw(c671.63,211.37) 708.48,211.37 ; SKT1.1@708.48,174.52 RF1.1@708.48,298.04 ; 708.48,213.88 ccw(c748.88,213.88) SKT1.1@720.31,185.31
CURRENT: FIL5.1 U4.9 | length 397.8
  Top Layer w8: U4.9@868.5,696.84 905.16,696.84 930,672 961.38,672 968.38,665 1047,665 1057,655 1057,504 FIL5.1@1037,484 ; U4.9@899.7,695.63 cw(c899.7,679.52) 911.09,690.91
GND: C1.2 C2.2 C3.2 C4.2 C5.2 C6.2 C7.2 C8.2 C9.2 C10.1 C11.2 C12.1 C13.2 C14.1 C15.2 C16.1 C17.1 C18.2 C19.1 C20.1 C21.2 C22.1 C23.2 C24.1 C25.1 C27.2 C28.2 C29.2 C30.2 C31.2 C32.2 C33.1 C34.2 C35.2 C36.2 CONN1.1 CONN2.1 CONN3.1 CONN4.1 CONN5.0 CONN5.5 CONN6.1 FIL1.2 FIL2.2 FIL3.2 FIL4.2 FIL5.2 FIL6.2 FIL7.2 JP1.3 JP2.3 JP3.3 JP4.3 JP5.3 JP6.3 R1.1 R9.1 R13.2 R14.1 R21.1 RF1.2 RF1.9 RF1.15 RF1.16 SKT1.2 U1.2 U2.2 U3.1 U3.11 U3.18 U4.12 U4.18 U4.28 U4.63 U5.3 U6.9 U6.11 U7.3 U7.4 U8.4 U9.2 X1.3 | length 3918.7
  Top Layer w8: C15.2@459,964.62 C15.2@464,969.62 ; C13.2@571.96,1324.38 cw(c559.67,1311.62) 577.38,1311.62 ; C13.2@577.38,1330 577.38,1311.62 ; 581.1,851.31 ccw(c616.31,851.31) v1@591.41,826.41 ; U4.28@581.1,870.62 ccw(c635.62,870.62) v1@597.07,832.07 ; U4.28@581.1,903.5 581.1,833.9 v1(590,825) ; C13.2@582.8,1324.38 ccw(c595.09,1311.62) 577.38,1311.62 ; U3.11@620.47,1277.76 620.47,1297.53 612,1306 583,1306 577.38,1311.62 ; U4.18@777.95,903.5 U4.18@777.95,905.5 777.95,941.95 808.71,972.71 C16.1@811.29,972.71 ; U4.18@779.17,936.7 cw(c794.78,936.7) 783.74,947.74 ; 794.71,958.71 ccw(c777.43,976) C16.1@801.87,976 ; C16.1@800.3,964.3 cw(c809.68,954.92) C16.1@809.68,968.19 ; v1(849,1279) 1003.38,1279 C29.2@1027,1255.38 ; v1@856.07,1271.93 cw(c873.14,1254.86) 873.14,1279 cw(c873.14,1303.14) v1@856.07,1286.07 ; U4.12@868.5,755.9 911.48,755.9 957.38,710 v1@1029,710 ; 927.53,739.85 ccw(c951,763.32) C18.2@951,730.13 ; v1@933.52,1080.63 cw(c927.31,1063.89) U6.11@945.16,1063.89 ; v1@936.3,1088.13 cw(c931.58,1075.39) 945.16,1075.39 ; v1@940,1095 945.16,1089.84 U6.11@945.16,1065.2 ; C18.2@956.52,719.96 ccw(c980.58,744.02) C17.1@980.58,710 ; 966.32,710 cw(c966.32,679.73) C17.1@987.72,701.13 ; 969.02,710 ccw(c969.02,736.45) C17.1@987.72,717.75 ; 969.36,713.01 ccw(c974.35,731.62) C17.1@987.82,717.84 ; U5.3@969.63,299.63 ccw(c980.8,310.79) v1@980.8,295 ; 975.81,711.28 cw(c971.52,695.29) C17.1@985.86,703.57 ; v1@984.51,305.28 cw(c966,316.8) 966,295 1031,295 1039,303 FIL6.2@1039,320.48 ; U6.9@984.53,1063.08 cw(c1002.47,1063.08) v1@997.67,1080.36 ; U6.9@984.53,1065.2 984.53,1079.53 ; 984.53,1073.6 cw(c999.55,1073.6) v1@995.53,1088.07 ; v1@985.8,1086.08 cw(c980.31,1083.75) 984.53,1079.53 ; v1@991.08,1080.8 ccw(c988.75,1075.31) 984.53,1079.53 ; v1(995,1090) 984.53,1079.53 ; v1@1005.28,504.11 cw(c996.97,499.44) 1003.71,492.71 ; 1006.94,1275.43 ccw(c1027,1295.49) C29.2@1027,1267.13 ; 1007.17,496.17 cw(c1014,489.34) v1@1014,499 ; C17.1@1008.27,717.75 ccw(c1026.98,736.45) v1@1026.98,710 ; C17.1@1008.41,701.27 cw(c1029,681.35) v1@1029,710 ; C17.1@1008.62,710 cw(c1008.62,675.62) v1@1032.93,699.93 ; v1@1014,513 v1(1014,509) 1014,503 1003.71,492.71 ; 1015.16,462 cw(c1015.16,454.94) FIL5.2@1020.15,459.93 ; C17.1@1015.46,713.09 ccw(c1022.12,737.96) v1@1035,715.66 ; C29.2@1016.45,1265.93 cw(c1009.84,1259.31) C29.2@1019.19,1259.31 ; 1017.66,712.5 cw(c1011.83,690.74) v1@1031.34,702 ; FIL5.2@1020.13,459.96 ccw(c1015.35,455.41) 1015.35,462 1011.91,462 1003.71,470.2 1003.71,492.71 ; 1023.1,710 ccw(c1023.1,723.9) v1@1032.93,714.07 ; v1@1035,704 v1@1029,710 ; 1039,307.12 cw(c1046.06,307.12) FIL6.2@1041.07,312.11 ; C22.1@1039.53,910 1058,928.47 1058,1028 1082,1052 v1@1082,1057 ; 1063.39,1033.39 ccw(c1037.79,1059) v1@1074,1059 ; 1075.46,1045.46 cw(c1084,1036.93) v1@1084,1049
  Top Layer w15: CONN5.5@174.41,361 199,361 ; v1@205.65,383.62 cw(c181.6,378.4) 199,361 ; v1(212,385) 212,374 199,361 ; C25.1@355,492 C25.1@355,502.44 ; C23.2@425,442.38 C23.2@425,446.38 ; C15.2@464,969.62 464,1014 v1(470,1020) 477.56,1027.56 C14.1@510,1027.56 ; 464,989.82 cw(c500.18,989.82) 474.6,1015.4 cw(c503.94,986.06) C14.1@503.94,1027.56 ; C14.1@502.2,1021.73 ccw(c488.12,1007.65) 488.12,1027.56 ccw(c488.12,1047.47) C14.1@502.2,1033.39 ; C16.1@813.62,976 C16.1@822,967.62 ; C16.1@814.51,972.95 cw(c796.43,954.87) 822,954.87 ; v1@827.5,930 ccw(c811.81,930) 822.9,941.1 ccw(c834,952.19) v1@834,936.5 ; v1@835.12,923.6 cw(c839.21,900.22) C21.2@856,917 ; v1@836.75,924.11 cw(c844.51,907.51) C21.2@853.67,923.38 ; v1@837.97,935.15 cw(c863,967.62) C16.1@822,967.62 ; v1@844.09,928.91 ccw(c862.44,947.27) C21.2@862.44,921.31 ; C21.2@866.38,917 C21.2@856,917 ; R9.1@1104.44,255.91 cw(c1129.72,230.63) 1129.72,266.38 ; 1122.63,266.38 cw(c1122.63,246.62) v1@1140.83,254.31 ; v1@1124.5,251 cw(c1145.02,251) 1130.51,265.51 ; v1@1127.01,248.47 ccw(c1100,237.05) 1100,266.38 1131.38,266.38 1185.94,320.94 ; v1@1139.5,251 cw(c1196.23,251) 1156.12,291.12 ; 1147.71,282.71 ccw(c1114.42,316) v1@1161.5,316 ; 1164.97,299.97 cw(c1205.2,259.75) CONN3.1@1205.2,316.63 ; v1@1172.45,320.74 ccw(c1179.09,327.8) 1185.94,320.94 ; v1@1172.6,311.4 cw(c1195.63,288.37) CONN3.1@1195.63,320.94 ; v1@1173.69,319.15 ccw(c1186.38,326.18) 1190.5,312.27 ; v1@1173.89,313.26 cw(c1185.94,307.66) 1185.94,320.94 ; 1190.58,325.58 cw(c1205.2,310.96) CONN3.1@1205.2,331.63 ; CONN3.1@1223.9,320.94 1185.94,320.94 ; C16.1@822,967.62 822,942 v1(834,930) 843,930 C21.2@856,917
  Top Layer w18: v1(425,410) C23.2@425,442.38 ; X1.3@973,597.76 1027.76,597.76
  Top Layer w24: CONN5.0@40.04,322.84 ccw(c-4.94,367.81) CONN5.0@58.67,367.81 ; CONN5.0@40.04,503.16 cw(c-4.94,458.19) CONN5.0@58.67,458.19 ; CONN5.0@51.17,374.68 cw(c33.08,356.58) 58.67,356.58 ; CONN5.0@51.17,451.32 ccw(c33.08,469.42) 58.67,469.42 ; 58.67,359.81 cw(c79.69,359.81) CONN5.0@64.83,374.68 ; CONN5.0@58.67,364.58 ccw(c117.71,364.58) 75.96,322.84 ccw(c99.71,346.58) 99.71,313 ; CONN5.0@58.67,386.09 58.67,301.59 CONN5.0@67.08,310 ; CONN5.0@58.67,449.09 58.67,525.33 58,526 CONN5.0@58,529 58,534.26 82.26,510 CONN5.0@143.65,510 ; CONN5.0@58.67,461.42 cw(c117.71,461.42) CONN5.0@75.96,503.16 ; 58.67,466.19 ccw(c79.69,466.19) CONN5.0@64.83,451.32 ; CONN5.0@67,313 CONN5.0@139.43,313 ; CONN5.0@75.96,286.91 cw(c138.94,223.93) CONN5.0@138.94,313 ; CONN5.0@76.33,538.71 ccw(c143.65,603.28) CONN5.0@143.65,510 ; CONN5.0@92.25,300.49 ccw(c80.1,345.82) CONN5.0@120.75,322.35 ; CONN5.0@92.86,313 ccw(c92.86,355.94) CONN5.0@123.22,325.58 ; CONN5.0@94.22,510 ccw(c94.22,552.43) CONN5.0@124.22,522.43 ; 97.27,522.43 cw(c86.84,483.49) CONN5.0@121.75,503.65 ; 100.46,313 cw(c100.46,280.81) CONN5.0@123.22,303.57 ; 101.02,521.42 ccw(c110.03,555.05) CONN5.0@127.44,524.9 ; 101.1,510 cw(c101.1,477.3) CONN5.0@124.22,500.42 ; 105.04,303.92 cw(c112.34,276.68) CONN5.0@126.44,301.1 ; CONN5.0@139.5,310 CONN5.0@148.67,319.17 ; CONN5.0@149.67,516.02 CONN5.0@143.65,510
  Bottom Layer w15: C19.1@988.62,698 1031,698 v1(1040,707) ; C19.1@996.61,685.95 cw(c1025.69,656.86) 1025.69,698 ; C19.1@1002.58,698 ccw(c1002.58,744.42) v1@1035.4,711.6
  other v1: 1171,36 264,37 240,70 1180,79 541,118 594,119 816,119 873,119 927,119 709,124 365,125 578,155 615,156 539,157 845,162 890,165 305,167 805,172 659,174 759,174 537,195 577,196 614,197 847,211 891,211 1385,219 805,221 35,230 229,236 534,236 572.5,236 611,236 1133,251 889,257 847,263 760.05,270 804,272 1177,272 760.05,300.47 993,300 1385.85,315.5 1168,316 806,323 760.05,330.93 659,354 691,361.4 723,361.4 755,361.4 1385.85,376 495,411 1385.85,436.5 1195,475 392,513 1385.85,536 1030,579 681,603 1030,620 1385.85,620 302,622 33,653 305,669 33,713.5 1385.85,718 304,745 499,767 33,774 500,810 704,812 304,823 1385.85,830 33,834.5 33,895 1385.85,937 33,955.5 625,1001 250,1004 126,1005 33,1016 1385.85,1038 1084,1059 726,1063 288,1072 530,1089 937,1090 875,1095 744,1119 540,1131 1090,1138 379,1143 509,1154 1130,1163 1205,1165 1268,1165 1328,1165 1385.85,1165 1033,1176 122,1179 820,1184 33,1195 1171,1203 1025,1221 342,1247 1171,1264.33 376,1277 247,1297 319,1297 539,1323 1171,1325.67 1101,1327.67 378,1332 247,1342 319,1342 247,1387 318.08,1387 389.15,1387 460.23,1387 531.31,1387 594,1387 673.46,1387 744.54,1387 827,1387 886.69,1387 957.77,1387 1028.85,1387 1099.92,1387 1171,1387
INV: R21.2 U4.8 U5.1 | length 909.6
  Top Layer w8: R21.2@841,301.38 R21.2@846.38,296 ; R21.2@845.55,302 U5.1@914,302 ; R21.2@848.92,294.49 cw(c867.04,276.37) 867.04,302 ; R21.2@848.92,308.32 ccw(c864.18,323.59) 864.18,302 ; 905.84,302 ccw(c905.84,314.06) U5.1@914.37,305.53 ; U5.1@914.83,296 U5.1@916.41,297.58 919,300.17 919,311.24 ; U5.1@915.45,306.21 ccw(c913.67,311.24) 919,311.24 ; U5.1@918.67,305.29 cw(c922.16,308.08) 919,311.24 ; U5.1@919.3,303.49 cw(c938.73,303.49) 924.99,317.23 ; v1@953.93,447.93 cw(c932.03,426.03) 963,426.03 ; v1(961,455) 963,453 963,415.37 989,389.37 989,355.17 956.21,322.38 930.14,322.38 919,311.24 ; 963,435.69 cw(c980.31,435.69) v1@968.07,447.93
  Top Layer w10: v1(810,689) 816.18,689 828.03,677.16 ; v1@812.76,680.43 cw(c819.6,659.26) 830.72,678.53 ; v1@813.03,680.53 cw(c817.87,667) 828.03,677.16 ; v1@818.69,691.33 ccw(c835.42,695.81) 826.76,680.82 ; v1@821.1,684.09 ccw(c837.3,700.29) U4.8@837.3,677.37 ; U4.8@868.5,677.16 828.03,677.16
  Bottom Layer w8: v1@806.88,695.88 832.12,695.88 ; v1@819.65,686.37 cw(c832.11,682.96) 832.11,695.88 ; v1@953.93,462.07 ccw(c936.86,479.14) 961,479.14 ccw(c985.14,479.14) v1@968.07,462.07 ; v1(961,455) 961,567 832.12,695.88
NetC8_1: C8.1 U1.4 | length 54.6
  Bottom Layer w20: 505,1281.17 ccw(c523.09,1281.17) U1.4@510.3,1268.38 ; C8.1@505,1303.38 505,1274.64 U1.4@513.24,1266.4
NetC9_1: C9.1 U2.4 | length 97.3
  Top Layer w25: U2.4@422.24,1057.6 436.65,1072 C9.1@474.38,1072 ; U2.4@427.37,1057.39 cw(c462.65,1022.12) 462.65,1072
NetC10_2: C10.2 C11.1 L1.2 U3.13 | length 292.8
  Top Layer w10: C11.1@485,1253.62 C11.1@489.62,1249
  Top Layer w12: C11.1@487.86,1239.67 cw(c510.39,1217.14) 510.39,1249 ; C11.1@487.86,1253.45 ccw(c498.61,1264.2) 498.61,1249 ; C11.1@489.62,1249 U3.13@572.24,1249 ; 506.21,1249 ccw(c506.21,1268.35) C10.2@519.89,1254.67 ; C10.2@528.11,1254.67 ccw(c541.79,1268.35) 541.79,1249
  Top Layer w20: C11.1@480,1245 L1.2@480,1340 ; 480,1262.77 ccw(c497.18,1262.77) C11.1@485.03,1250.62 ; 480,1308.18 cw(c515.32,1308.18) L1.2@490.34,1333.15
NetC12_2: C12.2 U3.20 | length 86.2
  Top Layer w12: C12.2@610.67,1084.86 ccw(c586.99,1108.54) U3.20@620.47,1108.54 ; C12.2@620.47,1073 U3.20@620.47,1122.24 ; 620.47,1094.47 ccw(c634.06,1094.47) C12.2@624.45,1084.86
NetC13_1: C13.1 U3.10 | length 59.1
  Top Layer w10: C13.1@625.58,1323.88 cw(c618.25,1308.81) 635,1308.81 ; C13.1@635,1326 635,1309.82 640.16,1304.66 U3.10@640.16,1287.76
NetC14_2: C14.2 U4.31 | length 73.9
  Top Layer w10: C14.2@510,972.44 522.05,960.39 U4.31@522.05,905.5 U4.31@522.05,903.5
NetC25_2: C25.2 U4.47 | length 120.5
  Top Layer w10: C25.2@359.5,552.03 cw(c376.32,535.2) 376.32,559 ; C25.2@360,557.56 361.44,559 U4.47@423.54,559 ; C25.2@366.57,544.96 cw(c400.47,511.06) U4.47@400.47,559
NetC26_1: C26.1 U6.12 | length 228.3
  Top Layer w8: U6.12@922.8,1065.2 U6.12@925.47,1065.2
  Top Layer w9: U6.12@922.8,1065.2 910,1078 910,1101 920.06,1111.06 920.06,1157.89 927.38,1165.22 967.74,1165.22 988.95,1144 C26.1@989,1144 ; 971.32,1161.63 cw(c942.65,1132.97) C26.1@983.19,1132.97 ; C26.1@984.7,1148.25 ccw(c994.44,1157.99) C26.1@994.44,1144.22
NetC26_2: C26.2 U6.8 | length 173.6
  Top Layer w12: C26.2@1040,1132 C26.2@1048,1124
  Top Layer w13: U6.8@1005,1039.53 1018.53,1039.53 1048,1069 C26.2@1048,1124 ; U6.8@1008.94,1038.93 ccw(c1008.94,1060.65) 1024.29,1045.29 ; C26.2@1043.02,1122.49 cw(c1031,1110.47) 1048,1110.47 ; 1048,1102.94 cw(c1075.65,1102.94) C26.2@1056.1,1122.49
NetC28_1: C28.1 U6.10 | length 107.3
  Top Layer w10: C28.1@947.56,1122.28 cw(c947.56,1107.42) C28.1@958.07,1117.93 ; C28.1@947.56,1131.44 947.56,1128.44 964.84,1111.16 ; C28.1@957.52,1131.38 ccw(c982.77,1129.09) 964.84,1111.16 ; U6.10@964.84,1065.2 964.84,1111.16
NetC29_1: C29.1 L3.1 U7.1 U7.2 | length 318.9
  Top Layer w14: U7.2@922.61,1320.31 U7.1@971.82,1320.31 1009.31,1320.31 C29.1@1027,1302.62 1028.53,1302.62 1080,1251.15 L3.1@1080,1248.5 ; U7.1@982.19,1320.31 cw(c982.19,1261.75) C29.1@1023.6,1303.16 ; 1012.07,1317.56 ccw(c1027,1332.49) C29.1@1027,1311.37 ; C29.1@1027,1293.87 cw(c1027,1269.07) 1044.54,1286.61 ; 1056.47,1274.68 cw(c1030.28,1248.5) L3.1@1067.32,1248.5 ; 1062.88,1268.27 ccw(c1080,1285.4) L3.1@1080,1261.18
NetC30_1: C30.1 C31.1 RF1.5 U9.5 | length 378.6
  Bottom Layer w20: C31.1@352.77,212.67 cw(c392.2,173.23) C30.1@392.2,229 ; C31.1@358.53,229 C30.1@397.38,229 C30.1@397.38,232.38
  Bottom Layer w25: 352.6,186.4 cw(c328.6,162.4) U9.5@362.54,162.4 ; C31.1@353.66,208.52 ccw(c402,205.49) U9.5@367.75,171.25 ; C31.1@358.53,229 C31.1@344.53,215 344.53,194.47 U9.5@367.76,171.24 ; U9.5@367.76,162.4 U9.5@367.76,171.24 ; RF1.5@382.87,275.58 cw(c346.35,239.06) C30.1@398,239.06 ; RF1.5@393.52,315.04 RF1.5@393.52,298.04 398,293.56 398,233 C30.1@397.38,232.38 ; C30.1@394.04,228.66 ccw(c374.76,239.78) 396.26,245.55
NetC34_1: C34.1 U9.4 | length 43.3
  Bottom Layer w20: C34.1@325,86.38 326.22,87.6 U9.4@367.76,87.6
NetCONN1_3: CONN1.3 FIL7.4 | length 100.3
  Top Layer w8: CONN1.3@447.23,215.33 ccw(c433.9,228.66) 452.76,228.66 ccw(c471.61,228.66) CONN1.3@458.28,215.33 ; FIL7.4@450.23,253.97 cw(c444.12,247.86) 452.76,247.86 ; CONN1.3@452.76,191.1 FIL7.4@452.76,255
NetCONN1_4: CONN1.4 FIL7.5 | length 156.8
  Top Layer w8: FIL7.5@463.39,292.78 cw(c463.39,278.29) 473.63,288.54 ; FIL7.5@466.08,296.08 492.13,270.04 CONN1.4@492.13,191.1 ; CONN1.4@486.6,215.33 ccw(c473.27,228.66) 492.13,228.66 ccw(c510.98,228.66) CONN1.4@497.65,215.33
NetCONN2_3: CONN2.3 FIL1.4 | length 181.8
  Top Layer w10: CONN2.3@195,933.11 215.89,933.11 228.32,920.68 ; CONN2.3@211.45,930.86 ccw(c236,955.41) 236,920.68 ; CONN2.3@213.97,926.3 cw(c214.71,907.08) 228.32,920.68 ; CONN2.3@218.52,937.93 ccw(c260.14,979.55) 260.14,920.68 ; CONN2.3@220.51,933.11 ccw(c231.67,933.11) CONN2.3@223.78,925.22 ; FIL1.4@273.52,920.68 228.32,920.68
NetCONN2_4: CONN2.4 FIL1.5 | length 174.1
  Top Layer w10: CONN2.4@195,893.74 217.26,893.74 229.69,881.31 ; CONN2.4@211.45,891.49 ccw(c236,916.04) 236,881.31 ; CONN2.4@214.27,886.95 cw(c215.91,867.54) 229.69,881.31 ; CONN2.4@218.52,898.56 ccw(c260.14,940.18) 260.14,881.31 ; FIL1.5@273.52,881.31 229.69,881.31
NetCONN2_5: CONN2.5 FIL2.4 | length 109.2
  Top Layer w10: CONN2.5@195,854.37 255.63,854.37 267.32,842.68 FIL2.4@273.52,842.68 ; CONN2.5@218.52,849.55 cw(c230.14,837.93) 230.14,854.37 cw(c230.14,870.81) CONN2.5@218.52,859.19
NetCONN2_6: CONN2.6 FIL2.5 | length 156.2
  Top Layer w10: CONN2.6@195,815 230,815 ; CONN2.6@212.54,817.97 cw(c218.77,802.03) 230.87,814.13 ; CONN2.6@216.18,808.66 cw(c224.85,786.48) 241.68,803.32 ; CONN2.6@218.55,810.21 cw(c230,798.91) 230,815 ; CONN2.6@218.55,819.79 ccw(c230,831.09) 230,815 ; FIL2.5@273.52,803.32 241.68,803.32 ; 230,815 241.68,803.32
NetCONN2_7: CONN2.7 FIL3.4 | length 156.2
  Top Layer w10: CONN2.7@195,775.63 218.37,775.63 228.32,765.68 ; CONN2.7@211.45,773.37 ccw(c230.01,791.94) 230.01,765.68 ; CONN2.7@215.51,769.06 cw(c219.01,756.38) 228.32,765.68 ; CONN2.7@218.52,780.45 ccw(c254.16,816.08) 254.16,765.68 ; FIL3.4@273.04,765.68 228.32,765.68
NetCONN2_8: CONN2.8 FIL3.5 | length 154.8
  Top Layer w10: CONN2.8@195,736.26 216.74,736.26 226.69,726.31 ; CONN2.8@211.45,734 ccw(c230.01,752.57) 230.01,726.31 ; CONN2.8@215.22,729.62 cw(c217.96,717.59) 226.69,726.31 ; CONN2.8@218.52,741.08 ccw(c254.16,776.71) 254.16,726.31 ; FIL3.5@273.04,726.31 226.69,726.31
NetCONN2_9: CONN2.9 FIL4.4 | length 134.1
  Top Layer w10: CONN2.9@195,696.89 216.11,696.89 224.63,688.37 FIL4.4@273.04,688.37 ; CONN2.9@211.45,694.63 ccw(c226.57,709.76) 226.57,688.37 ; CONN2.9@218.52,701.71 ccw(c250.71,733.9) 250.71,688.37
NetCONN2_10: CONN2.10 FIL4.5 | length 134.1
  Top Layer w10: CONN2.10@195,657.52 216.48,657.52 225,649 FIL4.5@273.04,649 ; CONN2.10@211.45,655.26 ccw(c226.57,670.39) 226.57,649 ; CONN2.10@218.52,662.34 ccw(c250.71,694.53) 250.71,649
NetCONN3_3: CONN3.3 R7.2 | length 171.6
  Top Layer w8: R7.2@1138.62,365 1169.29,365 ; R7.2@1142.18,356.21 cw(c1156.38,349.15) 1156.38,365 ; R7.2@1149.35,352.65 cw(c1169.29,342.73) 1169.29,365 ; 1189.78,385.49 cw(c1205.2,370.07) CONN3.3@1205.2,391.87 ; 1192.73,388.44 ccw(c1181.48,399.68) CONN3.3@1197.39,399.68 ; CONN3.3@1223.9,399.68 1203.97,399.68 1169.29,365
NetCONN3_4: CONN3.4 R6.2 | length 219.4
  Top Layer w8: R6.2@1149.5,401.5 1152.5,401.5 1190.06,439.06 ; R6.2@1149.59,407.78 ccw(c1149.59,429.96) 1165.28,414.28 ; R6.2@1159.37,398 cw(c1184.41,398) 1166.7,415.7 ; 1166.01,415.01 cw(c1205.2,375.83) CONN3.4@1205.2,431.24 ; 1179.67,428.67 cw(c1205.2,403.15) CONN3.4@1205.2,439.24 ; CONN3.4@1198.83,434.53 ccw(c1190.06,428.29) 1190.06,439.06 ; CONN3.4@1198.83,443.58 cw(c1190.06,449.82) 1190.06,439.06 ; CONN3.4@1223.9,439.06 1190.06,439.06
NetCONN4_3: CONN4.3 FIL6.4 | length 88.4
  Top Layer w10: CONN4.3@999.12,214.62 ccw(c984.17,229.57) 1005.31,229.57 ; CONN4.3@1003.94,191.1 1005.32,192.48 1005.32,232.32 FIL6.4@1020,247 ; 1005.32,222.92 ccw(c1017.05,222.92) CONN4.3@1008.75,214.62
NetCONN4_4: CONN4.4 FIL6.5 | length 94.9
  Top Layer w10: CONN4.4@1038.49,214.62 ccw(c1023.54,229.57) 1044.68,229.57 ; CONN4.4@1043.31,191.1 1044.68,192.48 1044.68,230.68 FIL6.5@1060,246 ; 1044.68,222.92 ccw(c1056.42,222.92) CONN4.4@1048.12,214.62 ; 1056.07,242.07 ccw(c1049.52,248.61) FIL6.5@1058.78,248.61
NetD1_3: D1.3 L4.2 | length 83
  Bottom Layer w40: D1.3@125,1126 125,1117 L4.2@199,1117
NetD2_1: D2.1 R1.2 | length 146
  Top Layer w12: D2.1@106.5,1123 141.38,1123 R1.2@162.38,1102 ; D2.1@116.17,1113.32 cw(c139.53,1089.96) 139.53,1123 cw(c139.53,1156.04) D2.1@116.17,1132.68 ; 145.74,1118.64 cw(c129.1,1102) R1.2@152.63,1102 ; R1.2@150.49,1113.89 ccw(c160.41,1123.81) R1.2@160.41,1109.78
NetD3_1: D3.1 R5.1 | length 187.8
  Top Layer w12: 318.62,363.08 ccw(c349.57,363.08) D3.1@327.69,341.19 ; 318.62,366.83 cw(c364.82,366.83) R5.1@332.15,399.5 ; R5.1@318.62,392.05 ccw(c378.54,392.05) D3.1@336.17,349.68 ; D3.1@326.5,340 318.62,347.87 318.62,403.62 R5.1@328,413
NetD4_1: D4.1 R20.1 | length 105.8
  Top Layer w8: R20.1@281.38,295 326.38,250 D4.1@331.5,250 ; R20.1@283.35,285.22 cw(c283.35,266.36) 296.68,279.7 ; R20.1@293.13,295 ccw(c321.49,295) 301.43,274.94
NetFIL1_1: FIL1.1 U4.34 | length 164.5
  Top Layer w8: FIL1.1@338.48,881.31 FIL1.1@343.69,881.31
  Top Layer w10: FIL1.1@343.69,881.31 352.69,881.31 382,852 382,826.54 393.59,814.95 U4.34@431.5,814.95 ; FIL1.1@344.78,880.8 cw(c344.78,860.48) 359.15,874.85 ; 388.49,820.06 ccw(c400.3,831.87) U4.34@400.3,815.17
NetFIL1_3: FIL1.3 U4.33 | length 131.6
  Top Layer w10: FIL1.3@338.48,920.68 373.32,920.68 400,894 U4.33@400,835
NetFIL5_4: FIL5.4 R6.1 | length 88.9
  Top Layer w8: R6.1@1093,404 FIL5.4@1093,442 ; 1093,415.36 ccw(c1115.77,415.36) R6.1@1099.67,399.26 ; 1093,434.67 ccw(c1135.08,434.67) R6.1@1105.32,404.92
NetFIL5_5: FIL5.5 R7.1 | length 187.2
  Top Layer w8: 1070.31,374.69 ccw(c1089.41,393.79) R7.1@1089.41,366.78 ; 1073.71,371.29 cw(c1059.42,357) R7.1@1079.63,357 ; FIL5.5@1082.54,475.54 ccw(c1077.39,480.68) FIL5.5@1084.67,480.68 ; R7.1@1091.38,365 1080,365 1068.67,376.33 1068.67,461.67 1087.68,480.68 FIL5.5@1092.48,480.68
NetFIL6_1: FIL6.1 R9.2 U5.2 | length 355.1
  Top Layer w8: U5.2@939.96,289.63 cw(c935.02,284.7) 942,284.7 cw(c948.98,284.7) U5.2@944.04,289.63 ; U5.2@941,291 942,290 942,279 956,265 996,265 1010,279 1049,279 1060,290 FIL6.1@1060,317.48 ; FIL6.1@1061.14,312.75 cw(c1067.16,310.98) 1068.78,317.04 ; 1074.57,319.48 cw(c1074.57,290.77) R9.2@1098.52,306.61 ; R9.2@1089.45,319.48 cw(c1089.45,300.61) R9.2@1105.19,311.02 ; R9.2@1090.25,308.35 ccw(c1076.12,309.46) 1086.14,319.48 ; R9.2@1091.84,302.2 ccw(c1059.69,280.93) FIL6.1@1059.68,319.48 1086.14,319.48 ; R9.2@1096.14,317.48 R9.2@1100,313.62 ; R9.2@1096.97,316.89 cw(c1093.67,327) 1086.14,319.48 ; R9.2@1100,305.62 1086.14,319.48
NetFIL7_1: FIL7.1 R3.1 U4.30 | length 857.1
  Top Layer w8: R3.1@375,375 R3.1@385,375 ; 377,336.49 cw(c427.92,336.49) R3.1@391.92,372.49 ; 377,355.8 cw(c408.61,355.8) R3.1@386.26,378.15 ; 382.16,300.84 cw(c376,294.68) FIL7.1@384.71,294.68 ; R3.1@385,381.38 R3.1@385,375 ; R3.1@386.26,380.67 ccw(c399.94,394.35) 399.94,375 ; R3.1@391.92,386.32 ccw(c419.26,413.66) 419.26,375 ; FIL7.1@393,295 388,295 377,306 377,367 R3.1@385,375 ; U4.30@541.73,903.5 541.73,812.76 525,796.02 525,690.96 522,687.96 522,648.04 528,642.04 528,596.23 479.91,548.14 479.91,531.91 451,503 451,386 440,375 R3.1@385,375
NetFIL7_3: FIL7.3 R4.1 U4.29 | length 845.4
  Top Layer w8: FIL7.3@392.52,255.32 425.32,255.32 433.67,263.67 433.67,318.67 ; R4.1@440.83,325.83 ccw(c431.67,335) R4.1@444.63,335 ; R4.1@450,335 433.67,318.67 ; R4.1@451.43,341.92 ccw(c411.43,381.92) 468,381.92 ; R4.1@453.15,325.3 ccw(c450.15,302.19) 433.67,318.67 ; R4.1@455,335 468,348 468,497 495.91,524.91 495.91,541.52 544,589.6 544,648.67 538,654.67 538,681.33 541,684.33 541,789.4 561.42,809.81 U4.29@561.42,903.5 ; R4.1@457.09,336.26 ccw(c430.74,362.6) 468,362.6
NetJP7_1: JP7.1 R13.1 U4.60 | length 1044.1
  Top Layer w10: v1@711.64,543.64 cw(c694.11,526.11) 718.9,526.11 ; R13.1@713.14,406.21 ccw(c698.99,420.36) 719,420.36 ; U4.60@718.9,466.5 U4.60@718.9,468.5 v1@718.9,558.68 ; 718.9,530.44 cw(c737.56,530.44) v1@724.36,543.64 ; R13.1@719,400 U4.60@719,454 ; 719,422.03 ccw(c741.38,422.03) R13.1@725.55,406.21
  Bottom Layer w8: v1@710.93,542.93 cw(c693.86,525.86) 718,525.86 cw(c742.14,525.86) v1@725.07,542.93 ; v1(718,550) 718,517 755,480 781.59,480 812.1,449.49 812.1,387.13 833.23,366 854,366 868,352 868,316.06 951.19,232.88 951.19,139.15 1006.34,84 1079,84 1118,45 JP7.1@1125,45 ; 1096,67 ccw(c1120.75,91.74) JP7.1@1120.75,56.75 ; 1102.64,60.36 cw(c1087.27,45) JP7.1@1109,45
NetR2_2: R2.2 U3.8 U4.20 | length 628.7
  Top Layer w8: U3.8@679,1272 679,1295 713,1329 752.77,1329 790,1291.77 790,1066.77 738,1014.77 738,893 U4.20@739,892 ; 679,1292.74 ccw(c687.14,1292.74) U3.8@681.38,1286.99 ; 774.57,1051.34 cw(c800,1025.91) R2.2@800,1061.87 ; R2.2@786.92,1063.69 ccw(c778.96,1071.65) R2.2@790.22,1071.65
NetR15_2: R15.2 U4.55 U8.1 | length 1120
  Top Layer w8: R15.2@588,374.62 R15.2@594,368.62 ; v1(588.29,408.08) 596.31,408.08 620.47,432.24 U4.55@620.47,466.5 ; R15.2@600,368.62 R15.2@600,373 ; 614.82,426.59 ccw(c604.12,437.3) U4.55@619.26,437.3 ; U4.55@620,466.02 U4.55@620.47,466.5 ; U4.55@620.47,468.5 U4.55@620.47,466.5
  Top Layer w12: v1@582.63,402.42 cw(c569.67,389.46) 588,389.46 ; v1@584.29,401.15 cw(c576.97,388.48) 591.11,392.27 ; R15.2@588,374.62 v1@588,407 ; 588,388.07 cw(c608.3,388.07) v1@593.95,402.42 ; v1@588,403.86 ccw(c627.27,403.86) R15.2@599.5,376.09 ; 592.65,386.52 cw(c614.28,392.32) v1@595.13,403.93
  Power w8: v1(588.29,408.08) 588.29,412.29 621,445 675.43,445 698.43,422 872,422 v1(873,423) ; v1@588.29,418.08 ccw(c588.29,432.06) 598.17,422.17 ; v1@598.29,408.08 cw(c632.59,408.08) 608.34,432.34 ; 846.44,422 ccw(c846.44,449.56) v1@865.93,430.07 ; 851.27,422 cw(c851.27,401.27) v1@865.93,415.93
  Bottom Layer w8: v1@865.93,415.93 cw(c822.3,372.3) 884,372.3 ; v1@871.59,421.59 cw(c841.62,391.62) 884,391.62 ; v1(873,423) 873,420 884,409 884,322.69 958.69,248 1049,248 1078.5,218.5 U8.1@1078.5,208.5 ; v1@877.24,427.24 cw(c860.93,410.93) 884,410.93 ; 1054.6,242.4 cw(c1024.21,212.01) U8.1@1067.19,212.01 ; 1068.26,228.74 cw(c1051.52,212.01) U8.1@1075.19,212.01
NetR16_2: R16.2 U4.62 U6.16 U7.7 | length 1375.8
  Top Layer w8: U4.62@758.27,466.5 U4.62@758.27,468.5 758.27,507.27 v1(778,527) ; U4.62@759.48,499.7 cw(c780.7,499.7) 765.7,514.7 ; 764.4,512.45 cw(c773.26,507.33) v1@775.66,517.28 ; 767.46,517.76 ccw(c759.87,522.14) v1@768.34,524.41 ; v1@768,527 cw(c743.86,527) 760.93,509.93 cw(c778,492.86) v1@778,517 ; v1@810,1129 ccw(c801,1141) 816,1141 ; v1(816,1121) 816,1141 ; v1@822,1129 cw(c831,1141) 816,1141 ; v1(870,987) 876.53,980.47 904.8,980.47 cw(c904.8,1015.38) v1@877.75,993.32 ; v1@871.55,988.26 ccw(c887.96,1001.64) 887.96,980.47 ; 909.1,1210.1 ccw(c895.35,1223.85) U7.7@914.8,1223.85 ; 909.69,1210.69 cw(c922.61,1197.77) U7.7@922.61,1216.04 ; U7.7@922.61,1233.69 922.61,1223.61 899,1200 875,1200 816,1141
  Power w8: v1@772,533 v1(778,527) ; v1@778,526 v1(778,527) ; v1(870,987) 864,981 813,981 754,922 754,791.29 742,779.29 742,712.29 756,698.29 756,638.43 771,623.43 771,598.57 748,575.57 748,545 766,527 v1(778,527)
  Bottom Layer w8: R16.2@814.38,527 R16.2@815.38,528
  Bottom Layer w10: v1@809.64,1114.64 cw(c794.27,1099.27) 816,1099.27 cw(c837.73,1099.27) v1@822.36,1114.64 ; v1(816,1121) 816,1038.82 867.82,987 v1(870,987) ; 850.91,1003.91 ccw(c870,1023) v1@870,996 ; 856.18,998.64 cw(c844.54,987) v1@861,987
  Bottom Layer w12: v1(778,527) R16.2@814.38,527 ; v1@783.66,521.34 cw(c797.31,507.69) 797.31,527 cw(c797.31,546.31) v1@783.66,532.66 ; 792.21,527 ccw(c792.21,549.2) R16.2@807.91,533.5 ; 797.04,527 cw(c797.04,511.63) R16.2@807.91,522.5
NetR17_2: R17.2 U4.61 U6.1 U7.8 | length 1326.4
  Top Layer w8: U4.61@738.58,468.5 739,468.91 739,524.77 777.23,563 v1(778,563) ; 759.62,545.38 cw(c778,527) v1@778,553 ; 761.47,547.24 ccw(c745.72,563) v1@768,563
  Top Layer w10: 847.81,969.19 ccw(c870,991.38) v1@870,960 ; 857.46,959.54 cw(c848.93,951) v1@861,951 ; v1@869.29,950.29 ccw(c884.49,965.49) 884.49,944 ; v1@876.36,957.36 ccw(c908.63,989.63) 908.63,944 ; U6.1@925.47,959.8 925.47,955.47 914,944 873,944 843,974 843,1143 883,1183 927,1183 971.82,1227.82 U7.8@971.82,1233.69 ; 953.42,1209.42 cw(c971.82,1191.02) U7.8@971.82,1217.04
  Power w8: v1@778.33,572.99 ccw(c778.89,590.1) 791,578 ; v1@779,560 779,566 791,578 ; v1@787.66,565.58 cw(c800.11,568.89) 791,578 ; v1(870,951) 856,951 847,960 821,960 774,913 774,776 762,764 762,720.57 776,706.57 776,646.71 791,631.71 791,578
  Bottom Layer w12: v1(778,563) 786,571 R17.2@815.38,571 ; v1@783.79,557.48 cw(c815.38,527.34) R17.2@815.38,571 ; R17.2@807.91,565.5 ccw(c794.63,552.22) 794.63,571 ccw(c794.63,589.78) R17.2@807.91,576.5
NetR18_2: R18.2 RF1.13 U4.50 | length 1095.8
  Top Layer w8: U4.50@522.05,466.5 U4.50@522.05,468.5 522.05,505.42 528,511.37 ; U4.50@523.26,499.71 cw(c539.44,499.93) 528,511.37 ; 629.33,669.33 cw(c655.09,643.57) v1@655.09,680 ; 641.62,681.62 ccw(c633.23,690) v1@645.09,690 ; v1(655.09,690) 659.24,694.15 659.24,694.24 655.28,690.28 650.28,690.28 576,616 576,576.35 528,528.35 528,511.37
  Top Layer w10: U4.50@522.05,466.5 522.05,400.14 528,394.18 R18.2@543.56,378.62 ; 529.06,393.13 cw(c504.52,368.59) R18.2@539.22,368.59
  Power w8: v1(470,866) 485.29,866 ; v1@471.23,867.58 ccw(c478.98,877.51) 487.89,868.6 ; v1@476.15,873.88 ccw(c484.59,884.7) 494.29,875 ; v1@479.16,861.99 cw(c485.29,859.31) 485.29,866 ; v1@479.16,870.01 ccw(c485.29,872.69) 485.29,866 ; v1(655.09,690) 677,711.91 677,748 641,784 641,844.71 610.71,875 494.29,875 ; 485.29,866 494.29,875
  Bottom Layer w10: RF1.13@461.35,896.4 cw(c449.51,874.96) 474,874.96 cw(c502.59,874.97) RF1.13@485.64,897.98 ; v1@463.64,872.36 ccw(c438.62,897.38) RF1.13@474,897.38 ; v1@465.5,873.79 ccw(c452,897.17) RF1.13@478.08,890.19 ; v1@474,875 474,921.4 475.3,922.7 RF1.13@472.26,922.7 ; 476.15,882.99 ccw(c492.05,878.73) v1@477.79,870.5 ; RF1.13@472.26,922.7 460,922.7 472.26,934.96 RF1.13@472.26,927.96 RF1.13@472.26,922.7